# Altium PCB Urukul.PcbDoc (part 1 of 15)
Units mm, origin at the board's own origin, x right, y up, seen from the top; angles counter-clockwise.
Board outline 161.99 x 100 mm, 6 copper layers (L1, L2, L3, L4, P5, L6), stack 1.548 mm thick; 1078 components, 609 nets, 3798 pads, 2552 vias.
Unrouted connection lines stored in the file: 1.
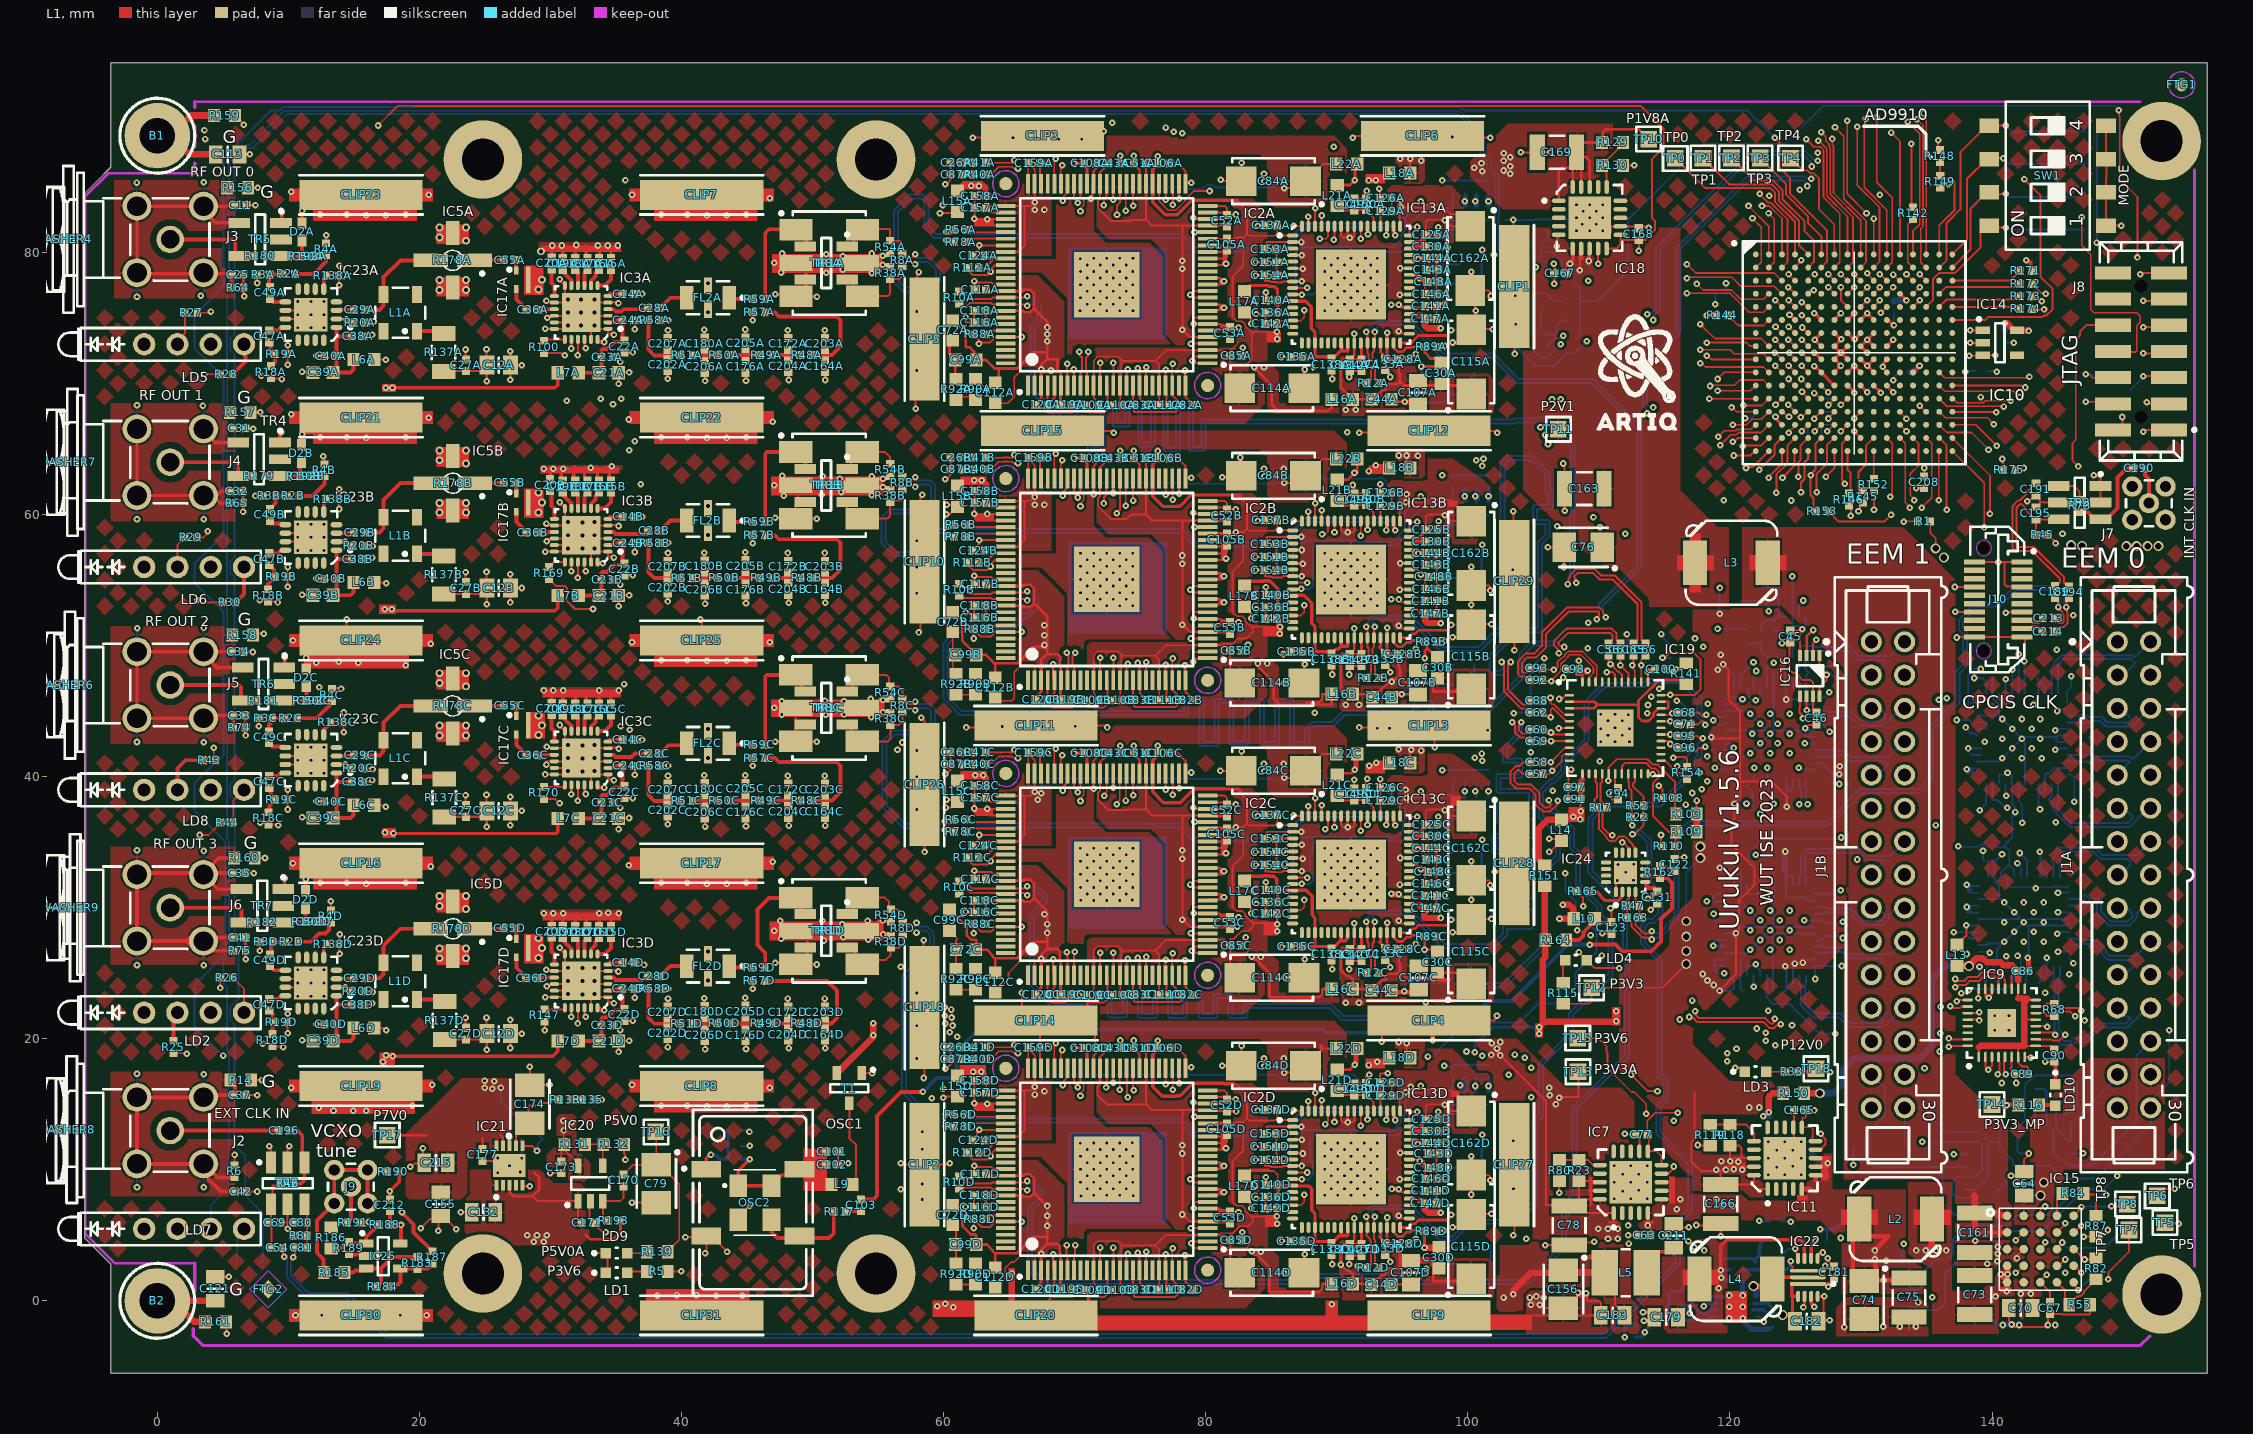
[diagram p0: L1 view]
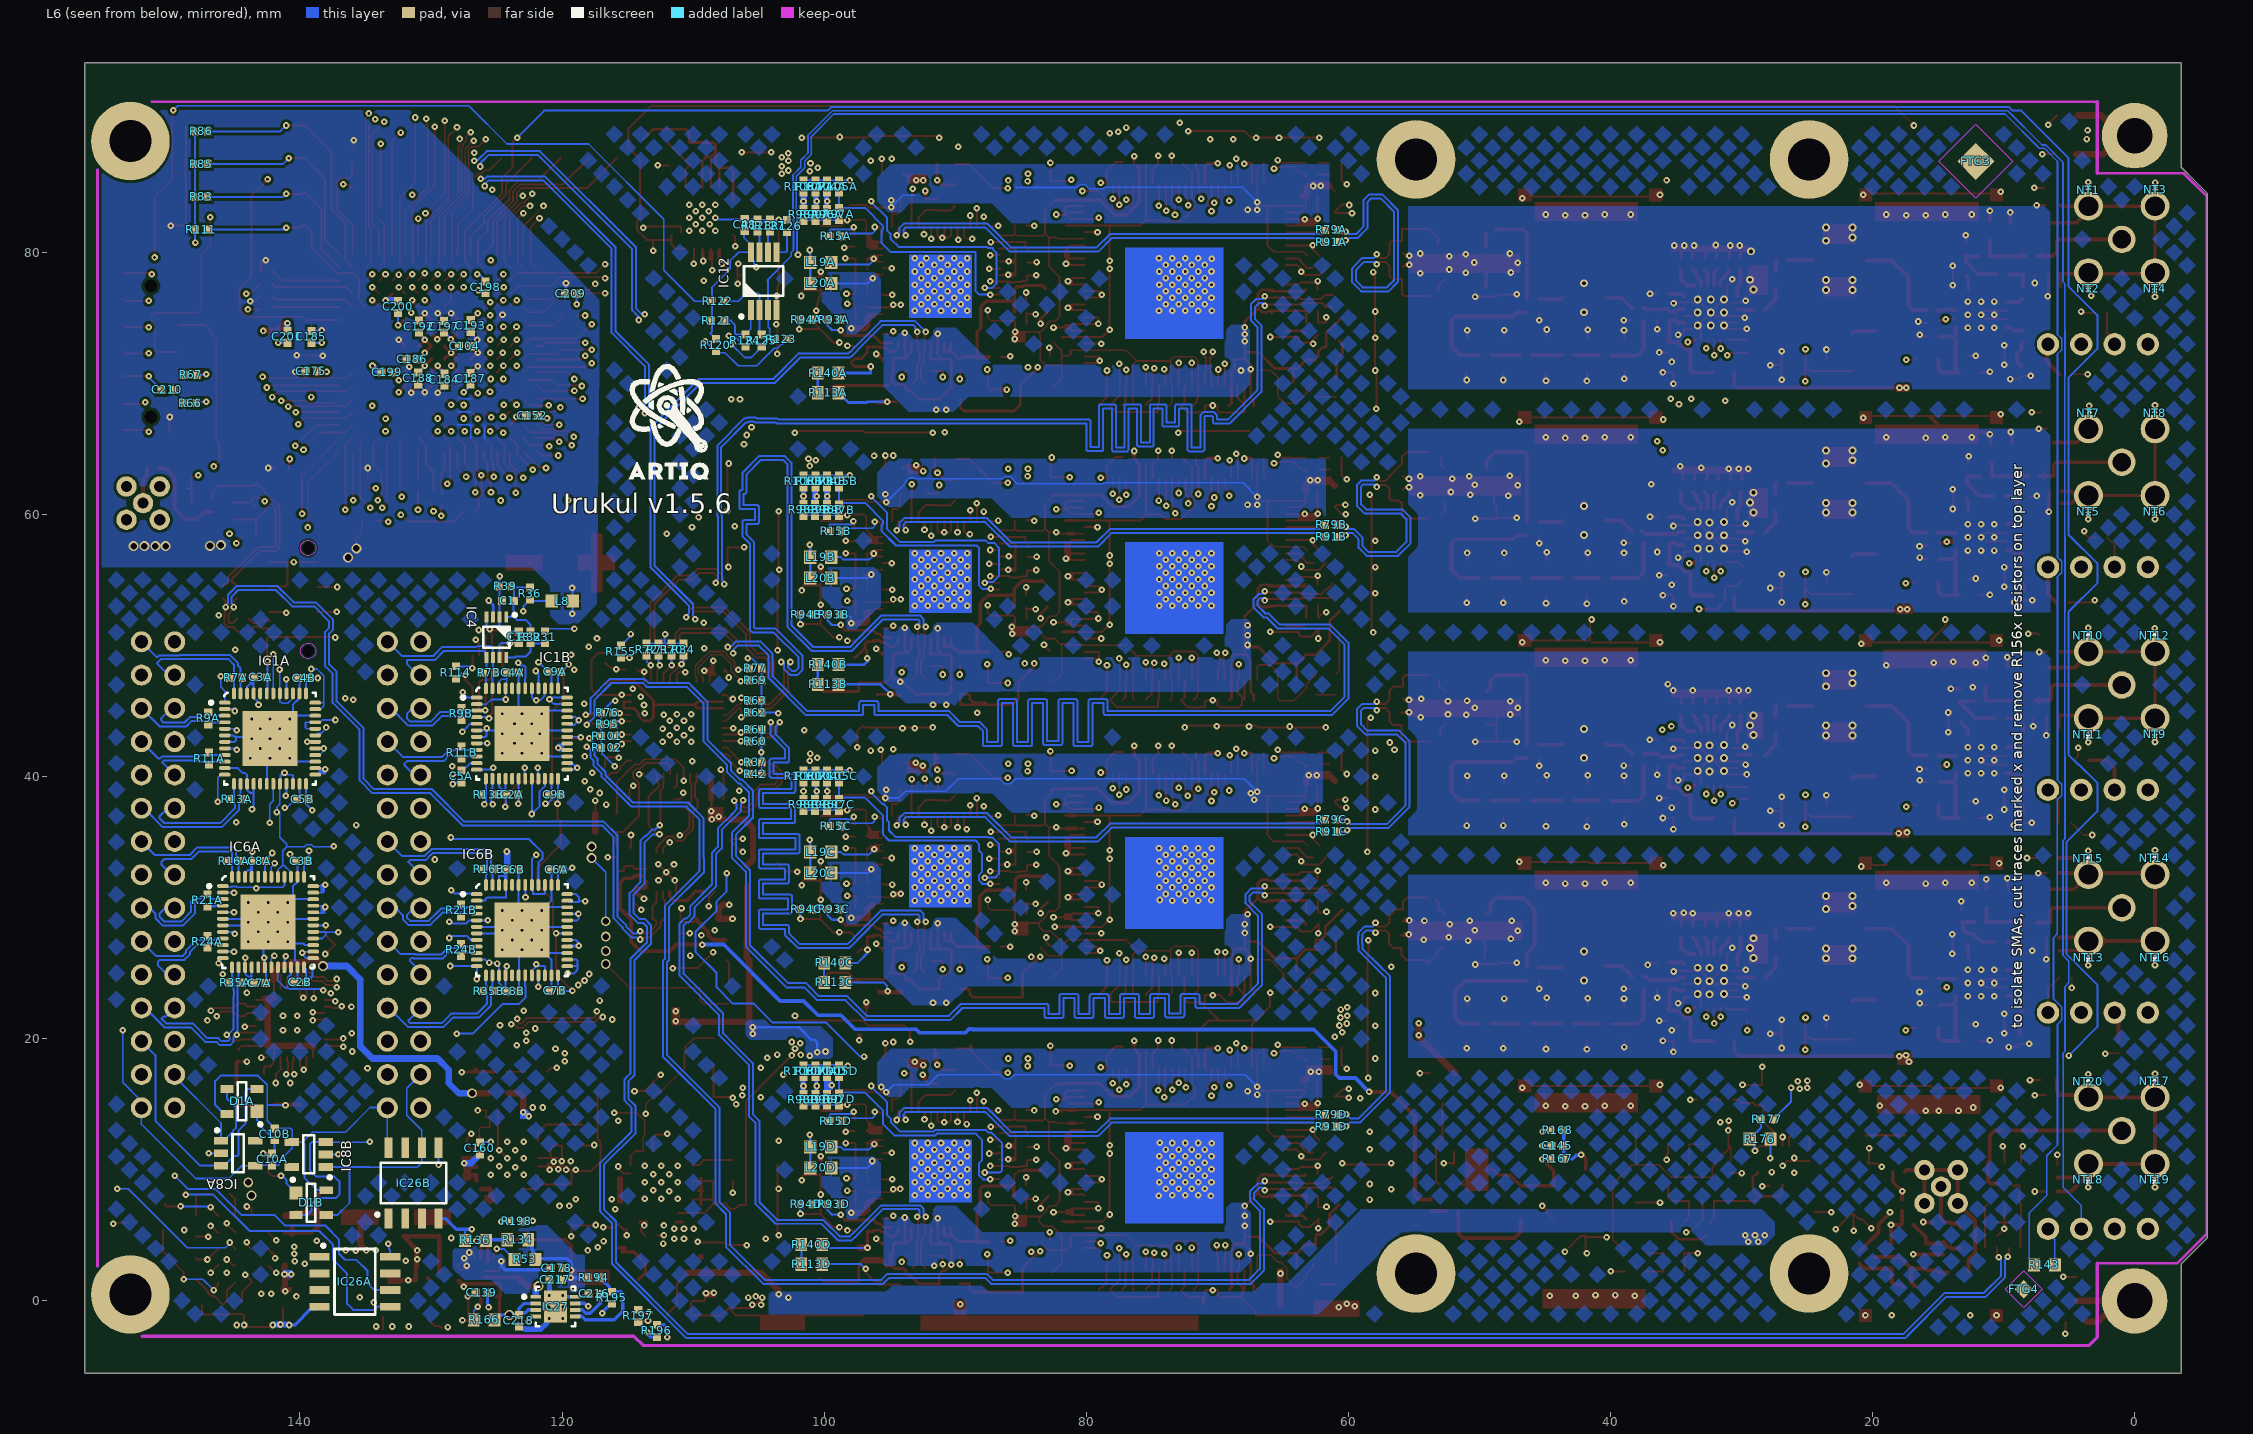
[diagram p1: L6 view, seen from below]
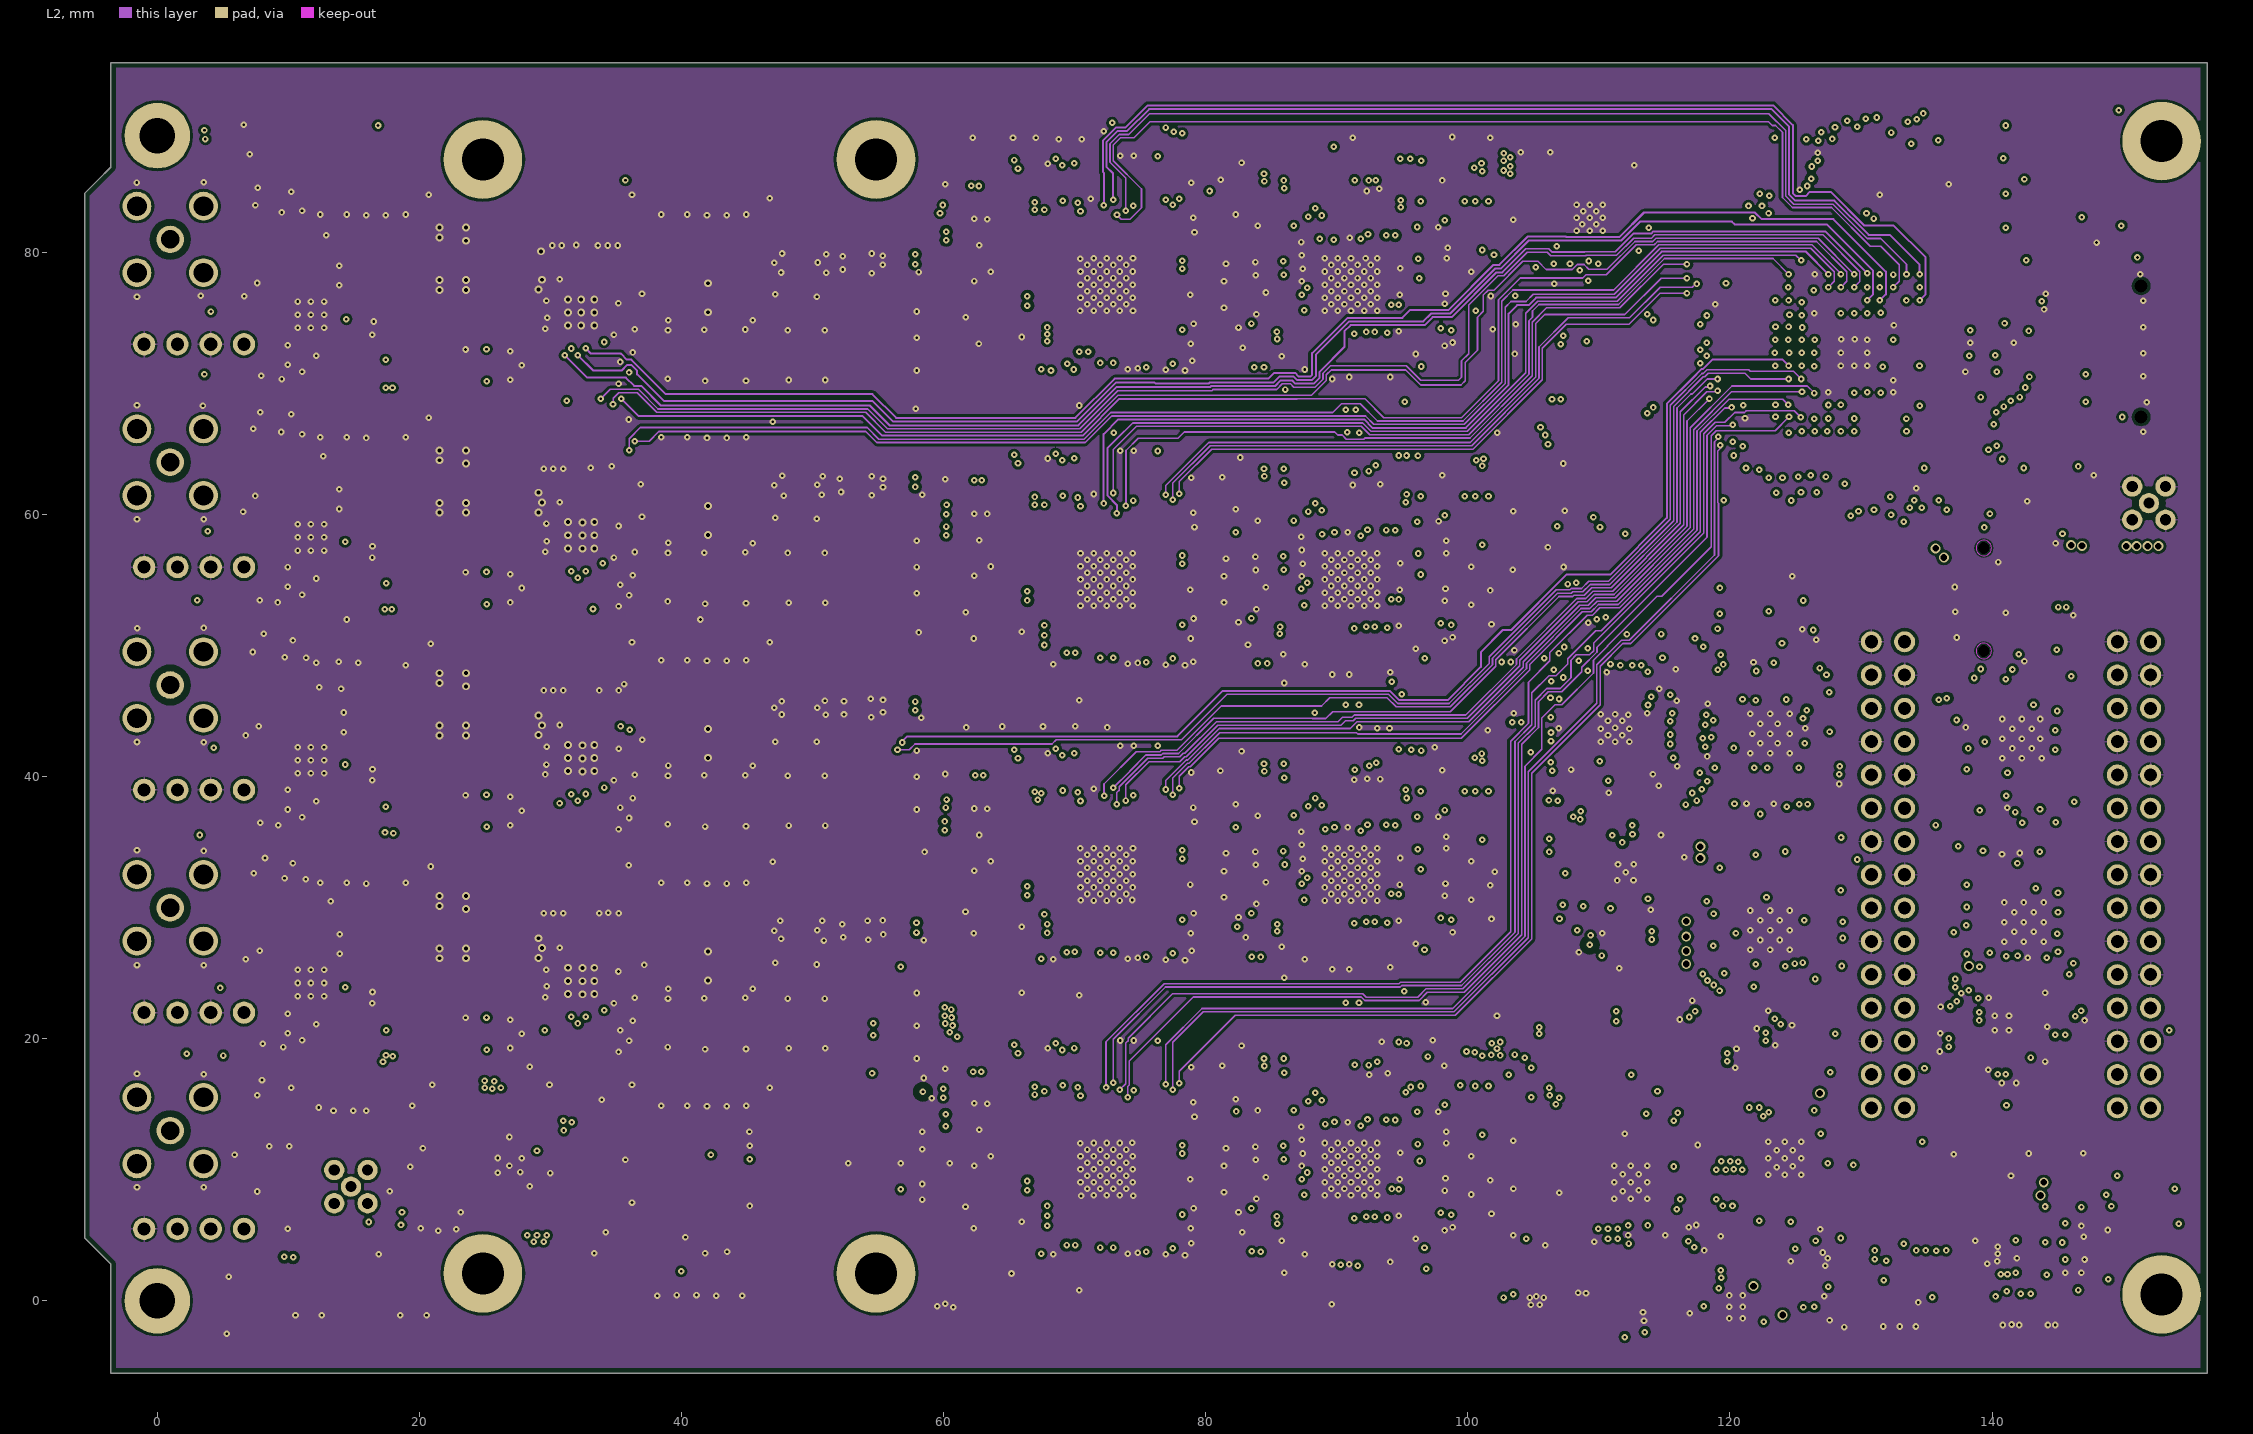
[diagram p2: L2]
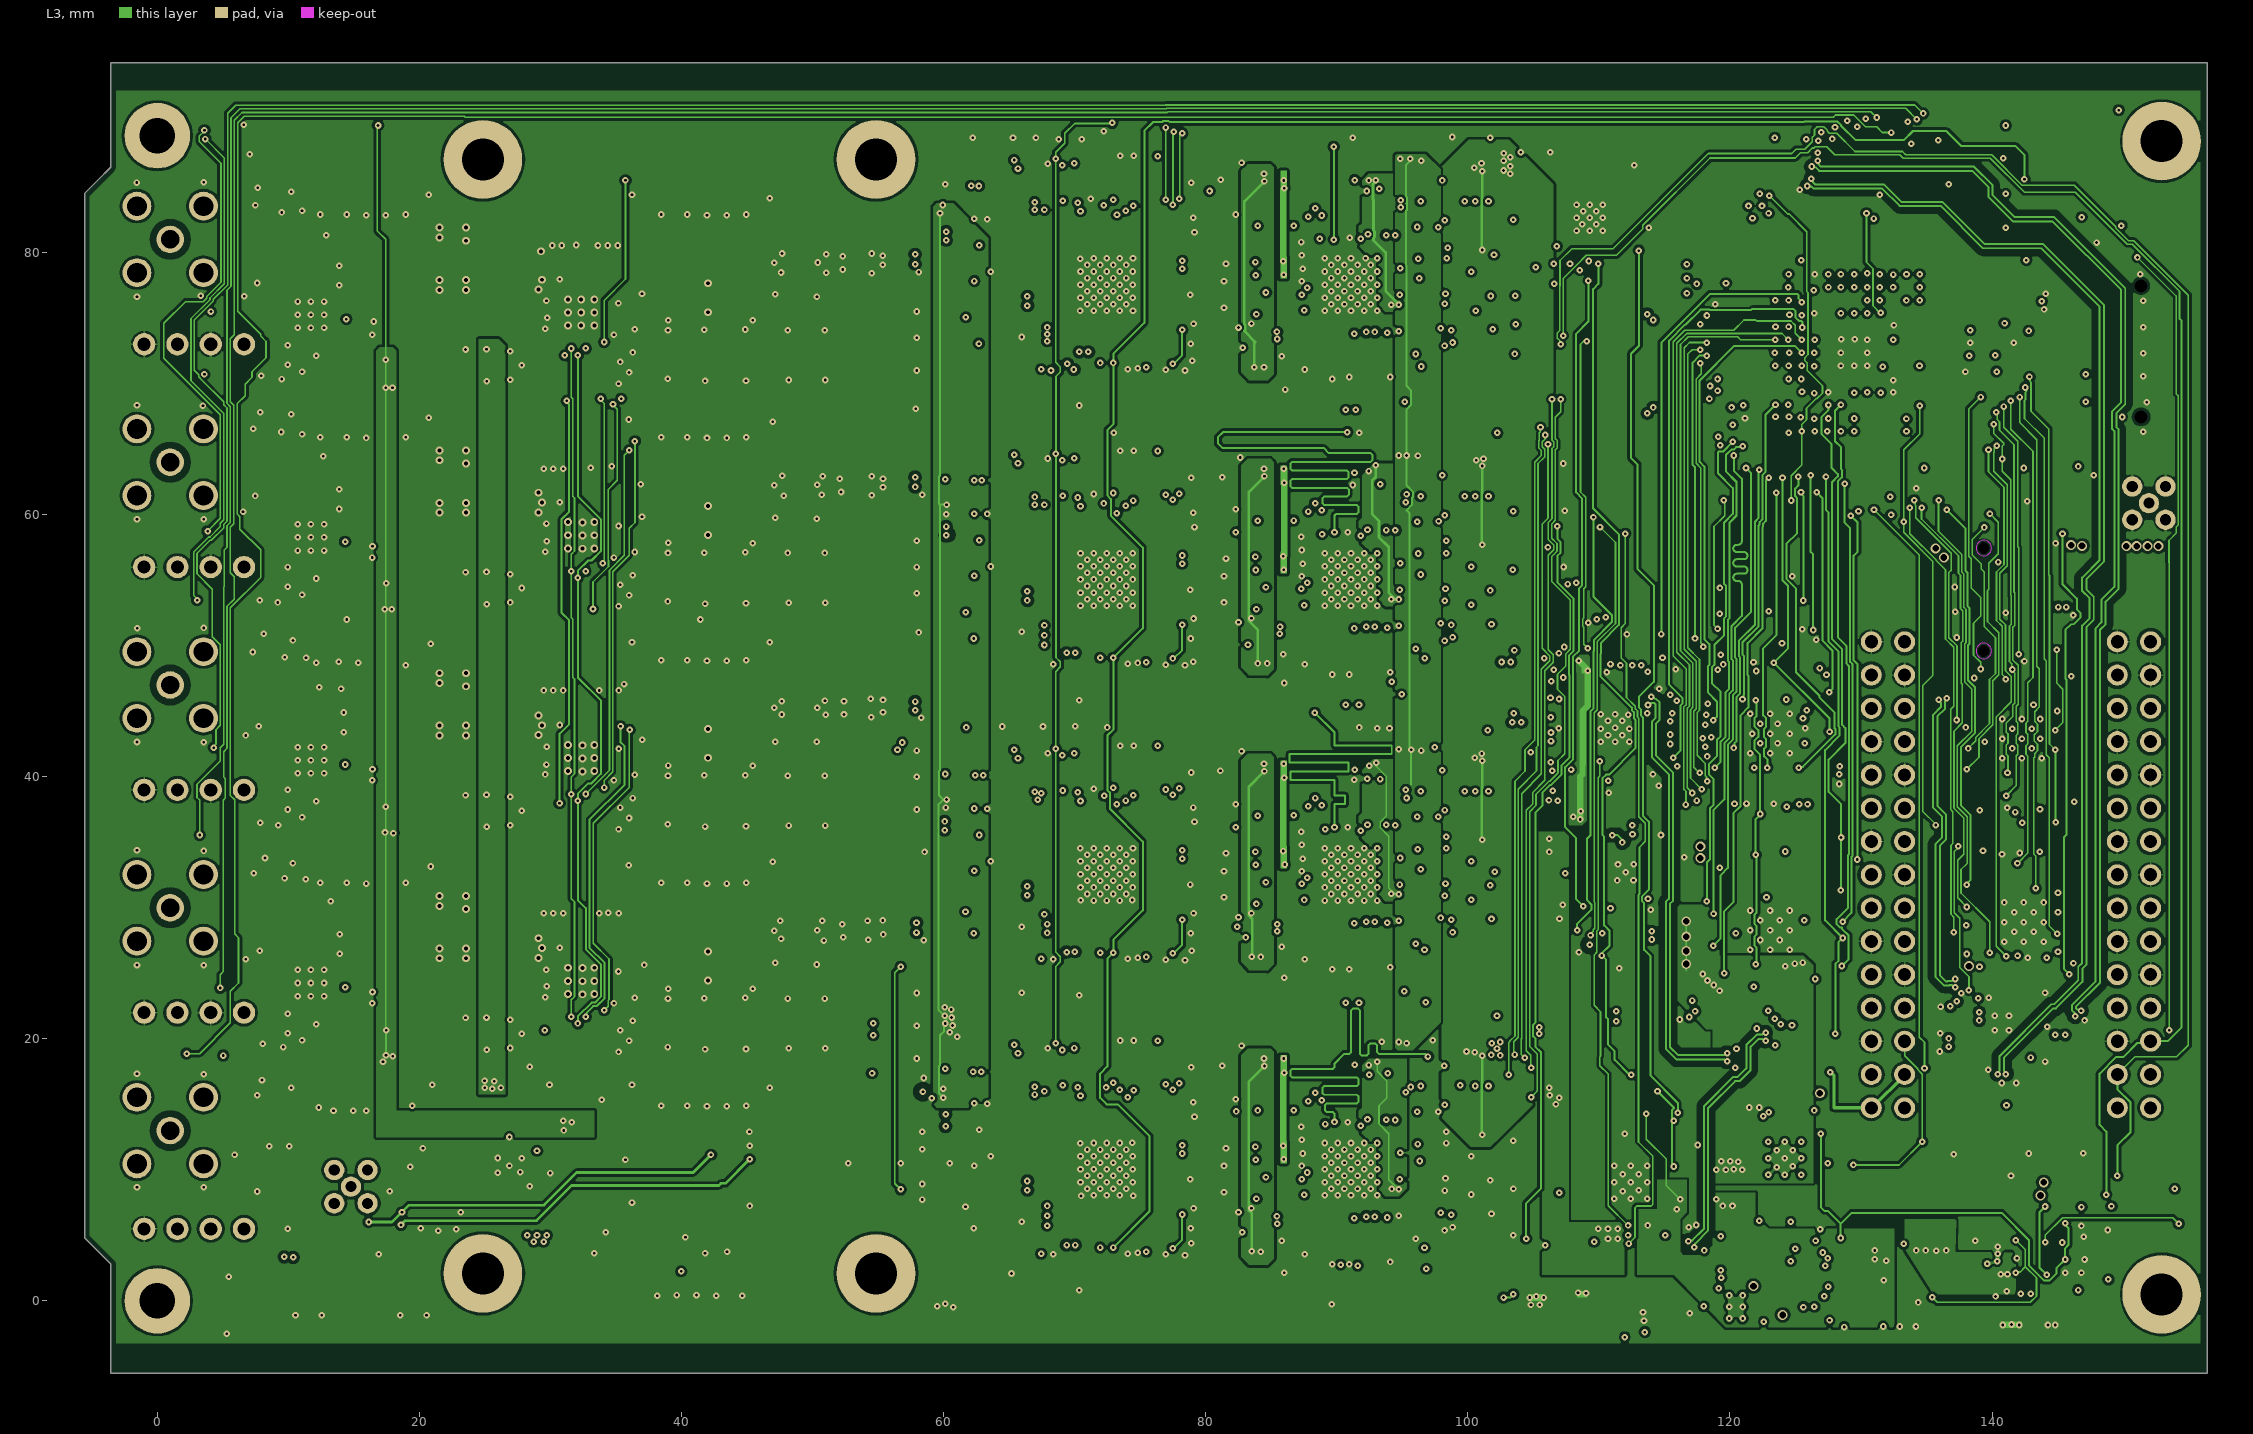
[diagram p3: L3]
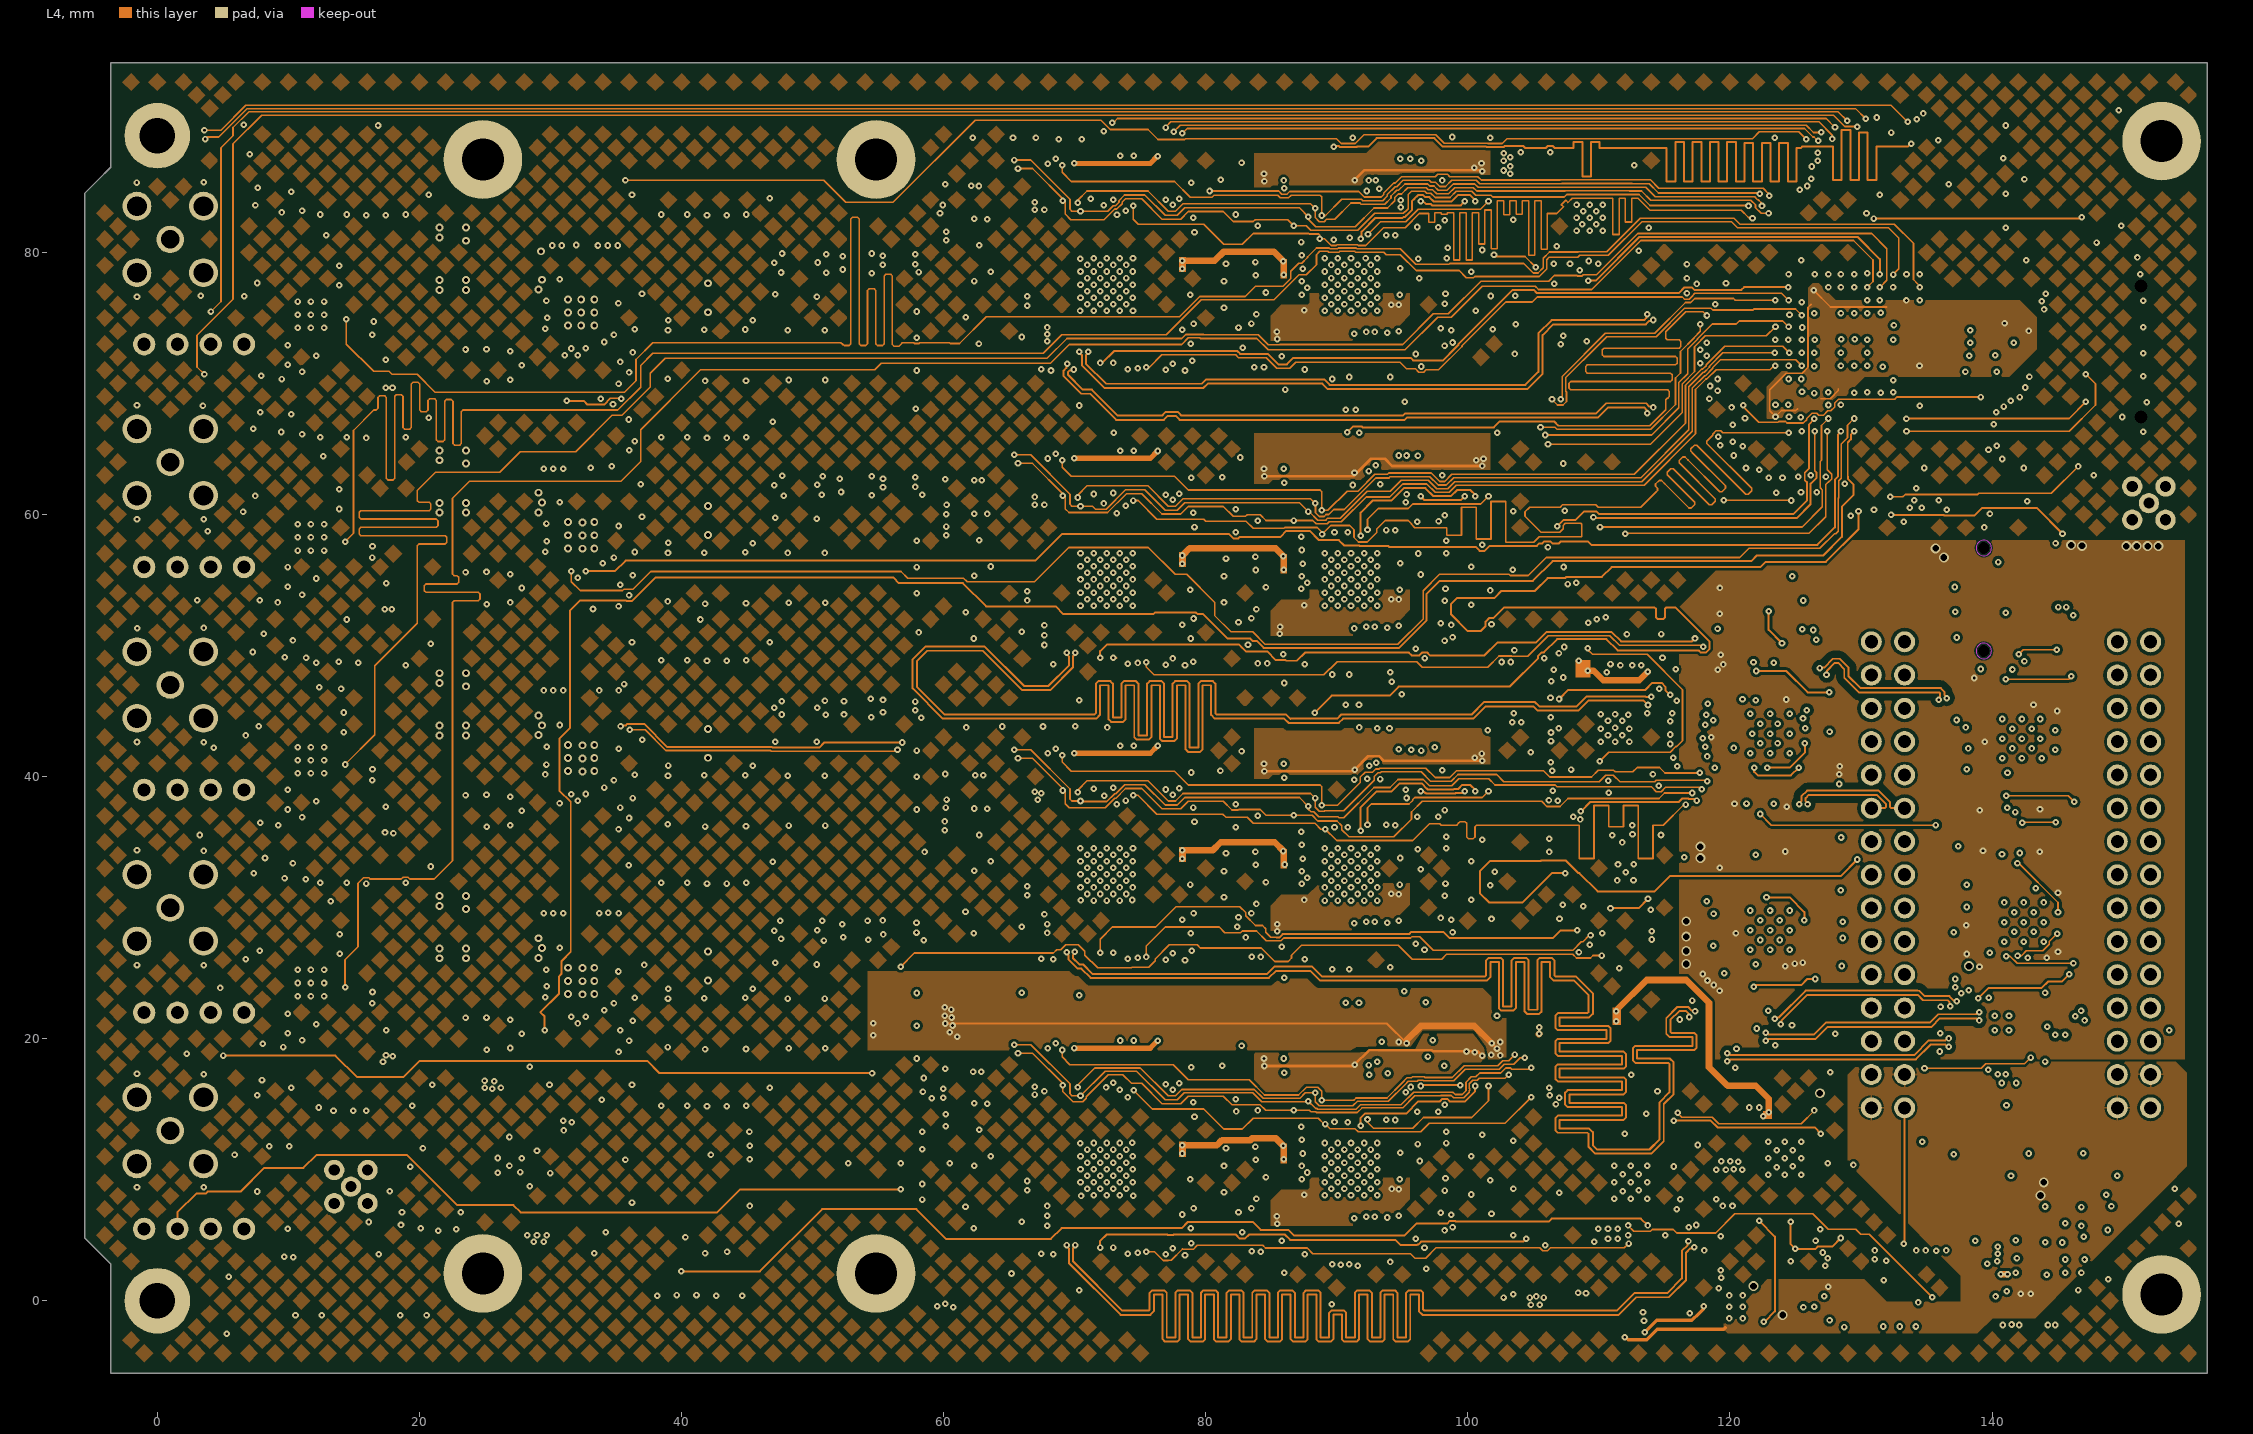
[diagram p4: L4]
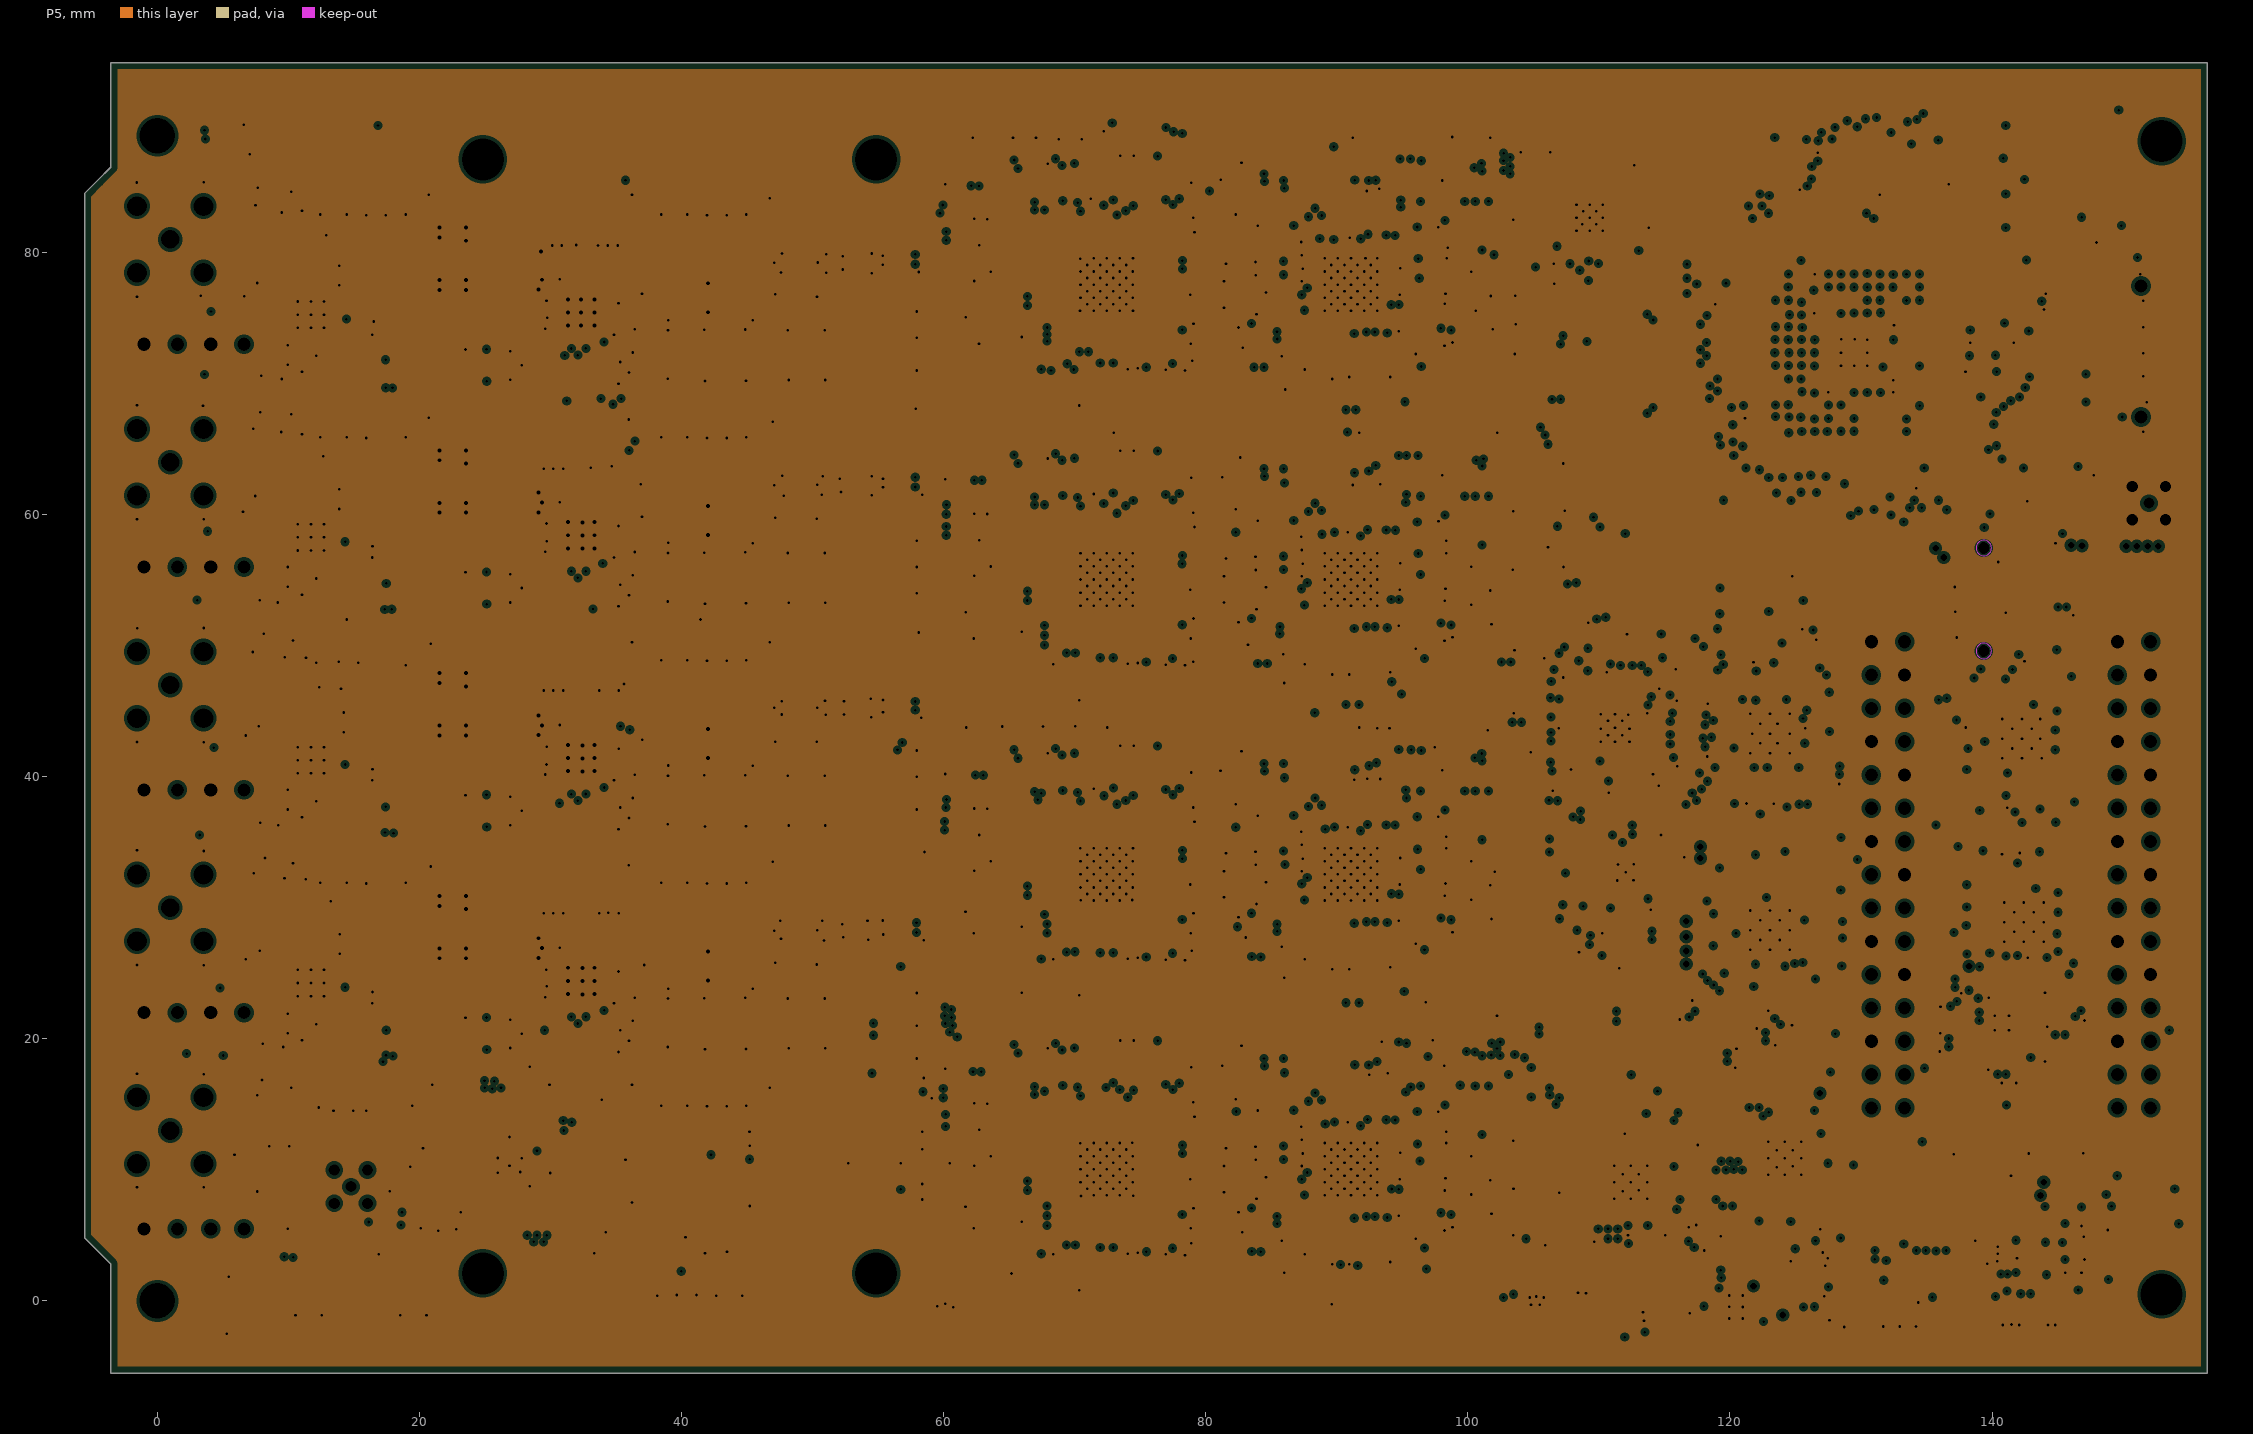
[diagram p5: P5, clearances drawn from the general rule]

## Layer stack, top to bottom
Top Solder: solder mask 0.034, Solder Resist, Dk 3.5
L1: signal copper 0.058
Dielectric1: core 0.18, FR4, Dk 4.2
L2: signal copper 0.018
Dielectric 9: prepreg 0.2, FR4, Dk 4.2
L3: signal copper 0.018
Dielectric 8: prepreg 0.6, Dk 4.2
L4: signal copper 0.018
Dielectric4: core 0.2, FR4, Dk 4.2
P5: plane copper 0.018, net GND
Dielectric3: core 0.18, FR4, Dk 4.2
L6: signal copper 0.058
Bottom Solder: solder mask 0.034, Solder Resist, Dk 3.5

## Board outline
-5.556,4.808 -5.556,77.513 -5.556,84.488 -4.556,85.488 -3.556,86.488 -3.556,94.488 156.439,94.488 156.439,-5.512 -3.556,-5.512 -3.556,2.808

## Design rules (kind name [scope] priority, off if disabled: settings)
AcuteAngle AcuteAngle_GND [InNet('GND')] p1: minimum=5.00000000000000E+0001 checktracksonly=FALSE
AcuteAngle [All] p2: minimum=5.00000000000000E+0001 checktracksonly=FALSE
BoardOutlineClearance BoardOutlineClearance_outer [OnBottomLayer OR OnTopLayer] p1: gap=0.25 ignorepadtopadclearanceinfootprint=FALSE
BoardOutlineClearance [OnCopper] p2: gap=0.4 ignorepadtopadclearanceinfootprint=FALSE
Clearance Clearance_1 [InPolygon vs (InDifferentialPairClass('All Differential Pairs'))] p1: gap=0.254 ignorepadtopadclearanceinfootprint=FALSE except(0: Arc-Hole Track-Hole SMDPad-Hole THPad-Hole Via-Hole Fill-Hole Poly-Hole Region-Hole Text-Hole; 0.508: Track-Poly)
Clearance Clearance_KeepOut [OnLayer('Keep-Out Layer') vs NOT (InComponent('J8') OR InComponent('J11'))] p2: gap=0.1 ignorepadtopadclearanceinfootprint=FALSE except(0: Arc-Hole Track-Hole SMDPad-Hole THPad-Hole Via-Hole Fill-Hole Poly-Hole Region-Hole Text-Hole)
Clearance Clearance_50_Ohms_GND_VIA [InNetClass('50_Ohms') vs (IsVia AND InNet('GND')) and not(IsPad)] p3: gap=0.2 ignorepadtopadclearanceinfootprint=FALSE except(0: Arc-Hole Track-Hole SMDPad-Hole THPad-Hole Via-Hole Fill-Hole Poly-Hole Region-Hole Text-Hole)
Clearance Clearance_50_Ohms_GND_Plane [InNetClass('50_Ohms') vs InPolygon] p4: gap=0.5 ignorepadtopadclearanceinfootprint=FALSE except(0: Arc-Hole Track-Hole SMDPad-Hole THPad-Hole Via-Hole Fill-Hole Poly-Hole Region-Hole Text-Hole)
Clearance Clearance_50_Ohms_GND_PADS [InNetClass('50_Ohms') vs InNet('GND')] p5: gap=0.2 ignorepadtopadclearanceinfootprint=FALSE except(0: Arc-Hole Track-Hole SMDPad-Hole THPad-Hole Via-Hole Fill-Hole Poly-Hole Region-Hole Text-Hole)
Clearance Clearance_50_Ohms [InNetClass('50_Ohms')] p6: gap=0.2 ignorepadtopadclearanceinfootprint=FALSE except(0: Arc-Hole Track-Hole SMDPad-Hole THPad-Hole Via-Hole Fill-Hole Poly-Hole Region-Hole Text-Hole)
Clearance Clearance_DiffPair_1 [(InDifferentialPairClass('All Differential Pairs')) vs (InDifferentialPairClass('All Differential Pairs'))] p7 off: gap=0.3 ignorepadtopadclearanceinfootprint=FALSE except(0: Arc-Hole Track-Hole SMDPad-Hole THPad-Hole Via-Hole Fill-Hole Poly-Hole Region-Hole Text-Hole)
Clearance [Not (OnLayer('Keep-Out Layer'))] p8: gap=0.127 ignorepadtopadclearanceinfootprint=FALSE except(0: Arc-Hole Track-Hole SMDPad-Hole THPad-Hole Via-Hole Fill-Hole Poly-Hole Region-Hole Text-Hole; 0.203: Arc-Poly Track-Poly SMDPad-Poly THPad-Poly Via-Poly Fill-Poly Poly-Poly)
Clearance Clearance_abs [All] p9: gap=0.1 ignorepadtopadclearanceinfootprint=FALSE except(0: Arc-Hole Track-Hole SMDPad-Hole THPad-Hole Via-Hole Fill-Hole Poly-Hole Region-Hole Text-Hole)
ComponentClearance [All] p1: gap=0 collisioncheckmode=3 verticalgap=0 showdistances=FALSE
DiffPairsRouting CLK_DiffPairsRouting [(InDifferentialPairClass('All Differential Pairs'))] p1: maxlimit=0.2 minlimit=0.15 mostfreqgap=0.17 toplayer_maxgap=0.16 toplayer_prefgap=0.16 toplayer_minwidth=0.14 toplayer_maxwidth=0.16 toplayer_prefwidth=0.152 midlayer2_mingap=0.16 midlayer2_maxgap=0.17 midlayer2_minwidth=0.14 midlayer2_maxwidth=0.16 midlayer2_prefwidth=0.15 midlayer3_mingap=0.16 midlayer3_maxgap=0.17 midlayer3_minwidth=0.14 midlayer3_maxwidth=0.16 midlayer3_prefwidth=0.15 bottomlayer_maxgap=0.16 bottomlayer_prefgap=0.16 bottomlayer_minwidth=0.14 bottomlayer_maxwidth=0.16 bottomlayer_prefwidth=0.152 impedanceprofiledriven=TRUE impedanceprofileid={BB04D2C2-95BE-479D-945A-180E0820E7BB} impedanceprofilevalue=100.000000 maxuncoupledlength=10
FabricationTestPointUsage TestPointUsage [All] p1: valid=0 allowmultiple=FALSE
FabricationTestpoint Testpoint [(IsPad And (OnTopLayer Or OnBottomLayer))] p1: side=3 testpointundercomponent=TRUE minsize=1.016 maxsize=2.54 preferedsize=1.524 minholesize=0 maxholesize=1.016 preferedholesize=0.813 testpointgrid=0.025 allowsidetop=TRUE allowsidebottom=TRUE usegrid=TRUE gridtolerance=0
Height BottomHeight [All] p1: minheight=0 maxheight=20 prefheight=10
Height TopHeight [OnLayer('Top Layer (LO)')] p2: minheight=0 maxheight=2.5 prefheight=1
HoleSize [All] p1: absolutevalues=TRUE maxlimit=5 minlimit=0.2 maxpercent=80.000 minpercent=20.000
HoleToHoleClearance [All] p1: gap=0.2 allowstackedmicrovias=TRUE
Length [All] p1 off: maxlimit=2540 minlimit=0
MatchedLengths "Diff pairs" [InDifferentialPairClass('All Differential Pairs')] p1: tolerance=2.54 checknetsindiffpair=TRUE checkdiffpairvsdiffpair=FALSE checkxsignals=FALSE checkothers=FALSE
MatchedLengths "Schematic Matched Net Lengths_1" [InNetClass('RFSW')] p2: tolerance=2.54 checknetsindiffpair=FALSE checkdiffpairvsdiffpair=TRUE checkxsignals=TRUE checkothers=TRUE
MatchedLengths "Schematic Matched Net Lengths" [InNetClass('RFSW_CPLD')] p3: tolerance=2.54 checknetsindiffpair=FALSE checkdiffpairvsdiffpair=TRUE checkxsignals=TRUE checkothers=TRUE
MatchedLengths DDS_UPDATE_AD9910 [InxSignalClass('DDS_UPDATE_AD9910')] p4: tolerance=2.54 checknetsindiffpair=FALSE checkdiffpairvsdiffpair=TRUE checkxsignals=TRUE checkothers=TRUE
MatchedLengths DDS_UPDATE_AD9912 [InxSignalClass('DDS_UPDATE_AD9912')] p5: tolerance=2.54 checknetsindiffpair=FALSE checkdiffpairvsdiffpair=TRUE checkxsignals=TRUE checkothers=TRUE
MatchedLengths "DDS SYNC" [InxSignalClass('DDSx_SYNC')] p6: tolerance=5 checknetsindiffpair=FALSE checkdiffpairvsdiffpair=TRUE checkxsignals=TRUE checkothers=TRUE
MatchedLengths "DDS RESET" [InxSignalClass('DDS_RESET')] p7: tolerance=2.54 checknetsindiffpair=FALSE checkdiffpairvsdiffpair=TRUE checkxsignals=TRUE checkothers=TRUE
MatchedLengths "CLK AD9912" [InxSignalClass('CLK AD9912')] p8: tolerance=5 checknetsindiffpair=FALSE checkdiffpairvsdiffpair=TRUE checkxsignals=TRUE checkothers=TRUE
MatchedLengths "CLK AD9910" [InxSignalClass('CLK AD9910')] p9: tolerance=5 checknetsindiffpair=FALSE checkdiffpairvsdiffpair=TRUE checkxsignals=TRUE checkothers=TRUE
MinimumAnnularRing MinimumAnnularRing_Blind [(InNetClass('50_Ohms') OR InDifferentialPairClass('All Differential Pairs'))] p1: minimumring=0.1
MinimumAnnularRing [All] p2: minimumring=0.1
MinimumSolderMaskSliver [All] p1: minsoldermaskwidth=0.05
PlaneClearance [All] p1: clearance=0.25
PlaneConnect PlaneConnect_pad [InPadClass('All Pads')] p1: planeconnectstyle=Relief reliefexpansion=0.508 reliefentries=4 reliefconductorwidth=0.254 reliefairgap=0.254
PlaneConnect [All] p2: planeconnectstyle=Direct reliefexpansion=0.508 reliefentries=4 reliefconductorwidth=0.254 reliefairgap=0.254
PolygonConnect PolygonConnect_pad [IsPad] p1: connectstyle=Relief reliefconductorwidth=0.15 reliefentries=4 polygonreliefangle="90 Angle" airgapwidth=0.152
PolygonConnect [All] p2: connectstyle=Direct reliefconductorwidth=0.254 reliefentries=4 polygonreliefangle="90 Angle" airgapwidth=0.254
RoomDefinition Urukul [InComponentClass('Urukul')] p1: confinementstyle=ConfineIn formatcopy=TRUE lockcomponents=FALSE outline -53.456,-101.612 -2.656,-101.612 -2.656,-76.212 -53.456,-76.212
RoomDefinition U_LVDS_IFCB [InComponentClass('U_LVDS_IFCB')] p2: confinementstyle=ConfineIn formatcopy=TRUE lockcomponents=FALSE outline -53.456,-101.612 -2.656,-101.612 -2.656,-76.212 -53.456,-76.212
RoomDefinition U_LVDS_IFCA [InComponentClass('U_LVDS_IFCA')] p3: confinementstyle=ConfineIn formatcopy=TRUE lockcomponents=FALSE outline -53.456,-101.612 -2.656,-101.612 -2.656,-76.212 -53.456,-76.212
RoomDefinition U_DDS_channel1 [InComponentClass('U_DDS_channel1')] p4: confinementstyle=ConfineIn formatcopy=TRUE lockcomponents=FALSE outline 59.794,45.138 102.394,45.138 102.394,65.138 59.794,65.138
RoomDefinition U_DDS_channel0 [InComponentClass('U_DDS_channel0')] p5: confinementstyle=ConfineIn formatcopy=TRUE lockcomponents=FALSE outline 59.794,67.638 102.394,67.638 102.394,87.638 59.794,87.638
RoomDefinition U_DDS_OUT_channel1 [InComponentClass('U_DDS_OUT_channel1')] p6: confinementstyle=ConfineIn formatcopy=TRUE lockcomponents=FALSE outline 1.544,66.388 58.544,66.388 58.544,52.388 1.544,52.388
RoomDefinition U_CTRL_LOGIC [InComponentClass('U_CTRL_LOGIC')] p7: confinementstyle=ConfineIn formatcopy=TRUE lockcomponents=FALSE outline 104.319,54.588 150.024,54.588 150.024,85.483 104.319,85.483
RoomDefinition U_DDS_OUT_channel0 [InComponentClass('U_DDS_OUT_channel0')] p8: confinementstyle=ConfineIn formatcopy=TRUE lockcomponents=FALSE outline 1.544,83.388 58.544,83.388 58.544,69.388 1.544,69.388
RoomDefinition U_DDS_OUT_channel3 [InComponentClass('U_DDS_OUT_channel3')] p9: confinementstyle=ConfineIn formatcopy=TRUE lockcomponents=FALSE outline 1.544,32.388 58.544,32.388 58.544,18.388 1.544,18.388
RoomDefinition U_DDS_OUT_channel2 [InComponentClass('U_DDS_OUT_channel2')] p10: confinementstyle=ConfineIn formatcopy=TRUE lockcomponents=FALSE outline 1.544,49.388 58.544,49.388 58.544,35.388 1.544,35.388
RoomDefinition U_CLK_INPUT [InComponentClass('U_CLK_INPUT')] p11: confinementstyle=ConfineIn formatcopy=TRUE lockcomponents=FALSE outline -5.456,-5.112 57.794,-5.112 57.794,17.138 -5.456,17.138
RoomDefinition U_Supply_DDS [InComponentClass('U_Supply_DDS')] p12: confinementstyle=ConfineIn formatcopy=TRUE lockcomponents=FALSE outline 128.544,-6.212 156.719,-6.212 156.719,56.788 128.544,56.788
RoomDefinition U_DDS_channel3 [InComponentClass('U_DDS_channel3')] p13: confinementstyle=ConfineIn formatcopy=TRUE lockcomponents=FALSE outline 59.794,0.138 102.394,0.138 102.394,20.138 59.794,20.138
RoomDefinition U_DDS_channel2 [InComponentClass('U_DDS_channel2')] p14: confinementstyle=ConfineIn formatcopy=TRUE lockcomponents=FALSE outline 59.794,22.638 102.394,22.638 102.394,42.638 59.794,42.638
RoutingVias [All] p1: holewidth=0.2 width=0.5 viastyle="Through Hole" minholewidth=0.2 minwidth=0.5 maxholewidth=0.6 maxwidth=1
SMDNeckDown [All] p1: percent=100.000
SMDToCorner [All] p1: distance=78740
SMDToPlane [All] p1: distance=0
SilkToSilkClearance [All] p1: silktosilkclearance=0
SilkToSolderMaskClearance SilkscreenOverComponentPads [IsPad] p1: minsilkscreentomaskgap=0 clearancetoexposedcopper=TRUE
SolderMaskExpansion SolderMaskExpansion_GND_VIA [IsVia AND InNet('GND')] p1: expansion=-0.1 istentingtop=FALSE
SolderMaskExpansion [All] p2: expansion=0.05 istentingtop=FALSE
Width Width-SE [InNetClass('50_Ohms')] p1: maxlimit=0.3 minlimit=0.159 preferedwidth=0.251 toplayer_minwidth=0.295 toplayer_prefwidth=0.298 bottomlayer_minwidth=0.295 bottomlayer_prefwidth=0.298 impedanceprofiledriven=TRUE impedanceprofileid={4DE8D0A8-98F2-4106-893B-CD1477E3F4D0} impedanceprofilevalue=50.000000 minimp=49.000000 maximp=51.000000 favimp=50.000000
Width [All] p2: maxlimit=3 minlimit=0.11 preferedwidth=0.254
18 further rules are at their usual default settings.

## Classes and differential pairs
net class RFSW: RFSW_CTRL0 RFSW_CTRL1 RFSW_CTRL2 RFSW_CTRL3
net class RFSW_CPLD: EEM1_4 EEM1_5 EEM1_6 EEM1_7
net class DDS_RESET[3..0]: DDS_RESET0 DDS_RESET1 DDS_RESET2 DDS_RESET3
net class OSK[3..0]: OSK0 OSK1 OSK2 OSK3
net class ATT_S_OUT[3..0]: ATT_S_OUT0 ATT_S_OUT1 ATT_S_OUT2 ATT_S_OUT3
net class ATT_S_IN[3..0]: ATT_S_IN0 ATT_S_IN1 ATT_S_IN2 ATT_S_IN3
net class ATT_LE[3..0]: ATT_LE0 ATT_LE1 ATT_LE2 ATT_LE3
net class 50_Ohms: CK_OSC CK_SMA_IN DAC_OUT_SEA DAC_OUT_SEB DAC_OUT_SEC DAC_OUT_SED INT_CLK_IN NetC28A_1 NetC28A_2 NetC28B_1 NetC28B_2 NetC28C_1 NetC28C_2 NetC28D_1 NetC28D_2 NetC29A_1 NetC29A_2 NetC29B_1 NetC29B_2 NetC29C_1 NetC29C_2 NetC29D_1 NetC29D_2 NetC36A_1 NetC36A_2 NetC36B_1 NetC36B_2 NetC36C_1 NetC36C_2 NetC36D_1 NetC36D_2 NetC47A_1 NetC47A_2 NetC47B_1 NetC47B_2 NetC47C_1 NetC47C_2 NetC47D_1 NetC47D_2 NetC49A_1 NetC49A_2 NetC49B_1 NetC49B_2 NetC49C_1 NetC49C_2 NetC49D_1 NetC49D_2 NetC50A_1 NetC50B_1 NetC50C_1 NetC50D_1 NetC55A_1 NetC55A_2 NetC55B_1 NetC55B_2 NetC55C_1 NetC55C_2 NetC55D_1 NetC55D_2 NetC103_2 NetC164A_1 NetC164B_1 NetC164C_1 NetC164D_1 NetC172A_1 NetC172B_1 NetC172C_1 NetC172D_1 NetC176A_1 NetC176B_1 NetC176C_1 NetC176D_1 NetC180A_1 NetC180B_1 NetC180C_1 NetC180D_1 NetC190_2 NetC196_2 NetC202A_1 NetC202B_1 NetC202C_1 NetC202D_1 NetFL2A_1 NetFL2B_1 NetFL2C_1 NetFL2D_1 NetJ3_1 NetJ4_1 NetJ5_1 NetJ6_1 NetOSC1_3 RF_OUT0 RF_OUT1 RF_OUT2 RF_OUT3
component class U_DDS_channel1: C26B C30B C43B C44B C51B C52B C53B C72B C82B C83B C84B C85B C87B C99B C105B C106B C107B C108B C109B C110B C111B C112B C114B C115B C116B C117B C118B C119B C120B C124B C125B C126B C127B C128B C129B C130B C133B C134B C135B C136B C137B C138B C140B C141B C142B C143B C144B C146B C147B C148B C149B C150B C151B C153B C154B C157B C158B C159B C162B IC2B IC13B L15B L16B L17B L18B L19B L20B L21B L22B R10B R12B R15B R40B R41B R56B R78B R79B R88B R89B R90B R91B R92B R93B R94B R96B R97B R98B R99B R104B R105B R106B R107B R112B R113B R140B
channel class LVDS_IFC_DDS: U_LVDS_IFC1 U_LVDS_IFCA U_LVDS_IFCB
component class U_CTRL_LOGIC: C104 C152 C175 C184 C185 C186 C187 C188 C192 C193 C197 C198 C199 C200 C201 C208 C209 C210 IC10 IC14 J8 R1 R66 R67 R83 R85 R86 R111 R142 R144 R145 R146 R148 R149 R171 R172 R173 R174 R175 SW1 TP0 TP1 TP2 TP3 TP4
component class U_CLK_INPUT: C54 C56 C57 C58 C59 C60 C61 C62 C65 C66 C68 C69 C71 C80 C81 C88 C91 C92 C93 C94 C95 C96 C97 C98 C100 C101 C102 C103 C122 C123 C131 C145 C189 C190 C191 C194 C195 C196 C212 C213 C214 IC19 IC24 IC25 J9 J10 L9 L10 L14 OSC1 OSC2 R17 R22 R34 R37 R42 R45 R46 R47 R52 R60 R61 R62 R63 R69 R70 R71 R72 R73 R76 R77 R81 R95 R101 R102 R103 R108 R109 R110 R117 R141 R151 R154 R155 R162 R163 R164 R165 R167 R168 R183 R184 R185 R186 R187 R188 R189 R190 R191 T1 TR2 TR3
component class Urukul: B1 B2 C1 C11 C13 C25 C31 C32 C33 C34 C35 C37 C41 C42 C45 C46 C86 C89 C90 C113 C121 CLIP1 CLIP2 CLIP3 CLIP4 CLIP5 CLIP6 CLIP7 CLIP8 CLIP9 CLIP10 CLIP11 CLIP12 CLIP13 CLIP14 CLIP15 CLIP16 CLIP17 CLIP18 CLIP19 CLIP20 CLIP21 CLIP22 CLIP23 CLIP24 CLIP25 CLIP26 CLIP27 CLIP28 CLIP29 CLIP30 CLIP31 FTG1 FTG2 FTG3 FTG4 IC4 IC9 IC16 J2 J3 J4 J5 J6 J7 L8 L13 LD2 LD5 LD6 LD8 NT1 NT2 NT3 NT4 NT5 NT6 NT7 NT8 NT9 NT10 NT11 NT12 NT13 NT14 NT15 NT16 NT17 NT18 NT19 NT20 R6 R14 R25 R26 R27 R28 R29 R30 R31 R32 R36 R39 R43 R44 R64 R65 R68 R74 R75 R100 R114 R147 R150 R152 R153 R156 R157 R158 R159 R160 R161 R169 R170 R179 R180 R181 R182 TR4 TR5 TR6 TR7 WASHER4 WASHER6 WASHER7 WASHER8 WASHER9
component class U_DDS_OUT_channel0: C12A C14A C15A C16A C17A C18A C19A C20A C21A C22A C23A C24A C27A C28A C29A C36A C38A C39A C40A C47A C49A C50A C55A C164A C172A C176A C180A C202A C203A C204A C205A C206A C207A D2A FL2A IC3A IC5A IC17A IC23A L1A L6A L7A R2A R3A R4A R8A R18A R19A R20A R38A R48A R49A R50A R51A R54A R57A R58A R59A R137A R138A R178A R192A TR1A TR8A
component class U_DDS_OUT_channel1: C12B C14B C15B C16B C17B C18B C19B C20B C21B C22B C23B C24B C27B C28B C29B C36B C38B C39B C40B C47B C49B C50B C55B C164B C172B C176B C180B C202B C203B C204B C205B C206B C207B D2B FL2B IC3B IC5B IC17B IC23B L1B L6B L7B R2B R3B R4B R8B R18B R19B R20B R38B R48B R49B R50B R51B R54B R57B R58B R59B R137B R138B R178B R192B TR1B TR8B
component class U_DDS_OUT_channel2: C12C C14C C15C C16C C17C C18C C19C C20C C21C C22C C23C C24C C27C C28C C29C C36C C38C C39C C40C C47C C49C C50C C55C C164C C172C C176C C180C C202C C203C C204C C205C C206C C207C D2C FL2C IC3C IC5C IC17C IC23C L1C L6C L7C R2C R3C R4C R8C R18C R19C R20C R38C R48C R49C R50C R51C R54C R57C R58C R59C R137C R138C R178C R192C TR1C TR8C
component class U_DDS_OUT_channel3: C12D C14D C15D C16D C17D C18D C19D C20D C21D C22D C23D C24D C27D C28D C29D C36D C38D C39D C40D C47D C49D C50D C55D C164D C172D C176D C180D C202D C203D C204D C205D C206D C207D D2D FL2D IC3D IC5D IC17D IC23D L1D L6D L7D R2D R3D R4D R8D R18D R19D R20D R38D R48D R49D R50D R51D R54D R57D R58D R59D R137D R138D R178D R192D TR1D TR8D
component class U_DDS_channel0: C26A C30A C43A C44A C51A C52A C53A C72A C82A C83A C84A C85A C87A C99A C105A C106A C107A C108A C109A C110A C111A C112A C114A C115A C116A C117A C118A C119A C120A C124A C125A C126A C127A C128A C129A C130A C133A C134A C135A C136A C137A C138A C140A C141A C142A C143A C144A C146A C147A C148A C149A C150A C151A C153A C154A C157A C158A C159A C162A IC2A IC13A L15A L16A L17A L18A L19A L20A L21A L22A R10A R12A R15A R40A R41A R56A R78A R79A R88A R89A R90A R91A R92A R93A R94A R96A R97A R98A R99A R104A R105A R106A R107A R112A R113A R140A
component class U_DDS_channel2: C26C C30C C43C C44C C51C C52C C53C C72C C82C C83C C84C C85C C87C C99C C105C C106C C107C C108C C109C C110C C111C C112C C114C C115C C116C C117C C118C C119C C120C C124C C125C C126C C127C C128C C129C C130C C133C C134C C135C C136C C137C C138C C140C C141C C142C C143C C144C C146C C147C C148C C149C C150C C151C C153C C154C C157C C158C C159C C162C IC2C IC13C L15C L16C L17C L18C L19C L20C L21C L22C R10C R12C R15C R40C R41C R56C R78C R79C R88C R89C R90C R91C R92C R93C R94C R96C R97C R98C R99C R104C R105C R106C R107C R112C R113C R140C
component class U_DDS_channel3: C26D C30D C43D C44D C51D C52D C53D C72D C82D C83D C84D C85D C87D C99D C105D C106D C107D C108D C109D C110D C111D C112D C114D C115D C116D C117D C118D C119D C120D C124D C125D C126D C127D C128D C129D C130D C133D C134D C135D C136D C137D C138D C140D C141D C142D C143D C144D C146D C147D C148D C149D C150D C151D C153D C154D C157D C158D C159D C162D IC2D IC13D L15D L16D L17D L18D L19D L20D L21D L22D R10D R12D R15D R40D R41D R56D R78D R79D R88D R89D R90D R91D R92D R93D R94D R96D R97D R98D R99D R104D R105D R106D R107D R112D R113D R140D
component class U_LVDS_IFCA: C2A C3A C4A C5A C6A C7A C8A C9A C10A D1A IC1A IC6A IC8A IC26A J1A R7A R9A R11A R13A R16A R21A R24A R35A
component class U_Supply_DDS: C48 C63 C64 C67 C70 C73 C74 C75 C76 C77 C78 C79 C132 C139 C155 C156 C160 C161 C163 C165 C166 C167 C168 C169 C170 C171 C173 C174 C177 C178 C179 C181 C182 C183 C211 C215 C216 C217 C218 IC7 IC11 IC12 IC15 IC18 IC20 IC21 IC22 IC27 L2 L3 L4 L5 LD1 LD3 LD4 LD7 LD9 LD10 R5 R23 R33 R53 R55 R80 R82 R84 R87 R115 R116 R118 R119 R120 R121 R122 R123 R124 R125 R126 R127 R128 R129 R130 R131 R132 R133 R134 R135 R136 R139 R143 R166 R176 R177 R193 R194 R195 R196 R197 R198 TP5 TP6 TP7 TP8 TP10 TP11 TP12 TP13 TP14 TP15 TP16 TP17 TP18
channel class DDS_channel: U_DDS_channel0 U_DDS_channel1 U_DDS_channel2 U_DDS_channel3
channel class DDS_OUT_channel: U_DDS_OUT_channel0 U_DDS_OUT_channel1 U_DDS_OUT_channel2 U_DDS_OUT_channel3
net class DDS_CSN[3..0]: DDS_CSN0 DDS_CSN1 DDS_CSN2 DDS_CSN3
net class DDS_SCKI[3..0]: DDS_SCKI0 DDS_SCKI1 DDS_SCKI2 DDS_SCKI3
net class DDS_SDI[3..0]: DDS_SDI0 DDS_SDI1 DDS_SDI2 DDS_SDI3
net class DDS_SDO[3..0]: DDS_SDO0 DDS_SDO1 DDS_SDO2 DDS_SDO3
net class DDS_UPDATE[3..0]: DDS_UPDATE0 DDS_UPDATE1 DDS_UPDATE2 DDS_UPDATE3
net class LED[7..0]: LED0 LED1 LED2 LED3 LED4 LED5 LED6 LED7
net class R\E\_DE[15..0]: R\E\_DE0 R\E\_DE1 R\E\_DE2 R\E\_DE3 R\E\_DE4 R\E\_DE5 R\E\_DE6 R\E\_DE7 R\E\_DE8 R\E\_DE9 R\E\_DE10 R\E\_DE11 R\E\_DE12 R\E\_DE13 R\E\_DE14 R\E\_DE15
net class DDS_PLL_LOCK[3..0]: DDS_PLL_LOCK0 DDS_PLL_LOCK1 DDS_PLL_LOCK2 DDS_PLL_LOCK3
net class SYNC_SMP_ERR[3..0]: SYNC_SMP_ERR0 SYNC_SMP_ERR1 SYNC_SMP_ERR2 SYNC_SMP_ERR3
net class DDS_CLK: DDS_CLKA_N DDS_CLKA_P DDS_CLKB0_N DDS_CLKB0_P DDS_CLKB1_N DDS_CLKB1_P DDS_CLKB2_N DDS_CLKB2_P DDS_CLKB3_N DDS_CLKB3_P DDS_CLKB_N DDS_CLKB_P DDS_CLKC_N DDS_CLKC_P DDS_CLKD_N DDS_CLKD_P
component class U_LVDS_IFCB: C2B C3B C4B C5B C6B C7B C8B C9B C10B D1B IC1B IC6B IC8B IC26B J1B R7B R9B R11B R13B R16B R21B R24B R35B
differential pair CPCIS_CLK: +CPCIS_CLK_P -CPCIS_CLK_N
differential pair DDS_CLKD: +DDS_CLKD_P -DDS_CLKD_N
differential pair DDS_CLKC: +DDS_CLKC_P -DDS_CLKC_N
differential pair DDS_CLKB: +DDS_CLKB_P -DDS_CLKB_N
differential pair DDS_CLKA: +DDS_CLKA_P -DDS_CLKA_N
differential pair CLKM: +CLKM_P -CLKM_N
differential pair CK_SMA: +CK_SMA_P -CK_SMA_N
differential pair CK_MMCX: +CK_MMCX_P -CK_MMCX_N
differential pair DAC_OUTD: +DAC_OUTD_P -DAC_OUTD_N
differential pair DAC_OUTC: +DAC_OUTC_P -DAC_OUTC_N
differential pair DAC_OUTB: +DAC_OUTB_P -DAC_OUTB_N
differential pair DAC_OUTA: +DAC_OUTA_P -DAC_OUTA_N
differential pair DAC_OUTRD: +DAC_OUTRD_P -DAC_OUTRD_N
differential pair DAC_OUTRC: +DAC_OUTRC_P -DAC_OUTRC_N
differential pair DAC_OUTRB: +DAC_OUTRB_P -DAC_OUTRB_N
differential pair DAC_OUTRA: +DAC_OUTRA_P -DAC_OUTRA_N
differential pair DDS_CLKB3: +DDS_CLKB3_P -DDS_CLKB3_N
differential pair DDS_CLKB2: +DDS_CLKB2_P -DDS_CLKB2_N
differential pair DDS_CLKB1: +DDS_CLKB1_P -DDS_CLKB1_N
differential pair DDS_CLKB0: +DDS_CLKB0_P -DDS_CLKB0_N
differential pair DDS3_SYNC_IN: +DDS3_SYNC_IN_P -DDS3_SYNC_IN_N
differential pair DDS2_SYNC_IN: +DDS2_SYNC_IN_P -DDS2_SYNC_IN_N
differential pair DDS1_SYNC_IN: +DDS1_SYNC_IN_P -DDS1_SYNC_IN_N
differential pair DDS0_SYNC_OUT: +DDS0_SYNC_OUT_P -DDS0_SYNC_OUT_N
differential pair DDS0_SYNC_IN: +DDS0_SYNC_IN_P -DDS0_SYNC_IN_N
differential pair LVDS7B: +LVDS7A_P -LVDS7A_N
differential pair LVDS7A: +LVDS7B_P -LVDS7B_N
differential pair CK_MMCX_IN: +CK_MMCX_IN_P -CK_MMCX_IN_N
differential pair LVDS7B: +LVDS6A_P -LVDS6A_N
differential pair LVDS7A: +LVDS6B_P -LVDS6B_N
differential pair LVDS6B: +LVDS5A_P -LVDS5A_N
differential pair LVDS6A: +LVDS5B_P -LVDS5B_N
differential pair LVDS5B: +LVDS4A_P -LVDS4A_N
differential pair LVDS5A: +LVDS4B_P -LVDS4B_N
differential pair LVDS4B: +LVDS3A_P -LVDS3A_N
differential pair LVDS4A: +LVDS3B_P -LVDS3B_N
differential pair LVDS3B: +LVDS2A_P -LVDS2A_N
differential pair LVDS3A: +LVDS2B_P -LVDS2B_N
differential pair LVDS2B: +LVDS1A_P -LVDS1A_N
differential pair LVDS2A: +LVDS1B_P -LVDS1B_N
differential pair CK_SMA_IN: +CK_SMA_IN_P -CK_SMA_IN_N
differential pair LVDS0A: +LVDS0B_P -LVDS0B_N
differential pair LVDS0B: +LVDS0A_P -LVDS0A_N
differential pair FB_SYNC: +FB_SYNC_P -FB_SYNC_N

## Components (designator, comment, footprint, x,y, rotation, side; value= is the part's Value field where it differs from the comment)
B1 "Plated Hole" MTG270_500 0,88.9 r90 top locked
B2 "Plated Hole" MTG270_500 0,0 r90 top locked
C1 "100nF" CAPC1005X55N 124.133,53.407 r180 bottom
C2A "100nF" CAPC1005X55N 123.808,38.632 r0 bottom (schematic designator C2)
C2B "100nF" CAPC1005X55N 139.981,24.296 r180 bottom (schematic designator C2)
C3A "100nF" CAPC1005X55N 143.006,47.571 r0 bottom (schematic designator C3)
C3B "100nF" CAPC1005X55N 139.856,33.546 r180 bottom (schematic designator C3)
C4A "100nF" CAPC1005X55N 123.758,47.932 r0 bottom (schematic designator C4)
C4B "100nF" CAPC1005X55N 139.681,47.521 r180 bottom (schematic designator C4)
C5A "100nF" CAPC1005X55N 127.683,40.007 r90 bottom (schematic designator C5)
C5B "100nF" CAPC1005X55N 139.781,38.271 r180 bottom (schematic designator C5)
C6A "100nF" CAPC1005X55N 120.408,32.907 r180 bottom (schematic designator C6)
C6B "100nF" CAPC1005X55N 123.733,32.907 r0 bottom (schematic designator C6)
C7A "100nF" CAPC1005X55N 143.056,24.246 r0 bottom (schematic designator C7)
C7B "100nF" CAPC1005X55N 120.508,23.657 r180 bottom (schematic designator C7)
C8A "100nF" CAPC1005X55N 143.081,33.546 r0 bottom (schematic designator C8)
C8B "100nF" CAPC1005X55N 123.733,23.607 r0 bottom (schematic designator C8)
C9A "100nF" CAPC1005X55N 120.533,47.982 r180 bottom (schematic designator C9)
C9B "100nF" CAPC1005X55N 120.558,38.632 r180 bottom (schematic designator C9)
C10A "100nF" CAPC1005X55N 142.123,10.783 r270 bottom (schematic designator C10)
C10B "100nF" CAPC1005X55N 141.923,12.708 r90 bottom (schematic designator C10)
C11 "10nF" CAPC1005X55N 6.346,83.596 r0 top
C12A "1uF" CAPC2012X140N 26.044,71.388 r180 top (schematic designator C12)
C12B "1uF" CAPC2012X140N 26.044,54.388 r180 top (schematic designator C12)
C12C "1uF" CAPC2012X140N 26.044,37.388 r180 top (schematic designator C12)
C12D "1uF" CAPC2012X140N 26.044,20.388 r180 top (schematic designator C12)
C13 "100nF" CAPC1005X55N 123.308,50.632 r270 bottom
C14A "10nF" CAPC1005X55N 35.944,76.813 r180 top (schematic designator C14)
C14B "10nF" CAPC1005X55N 35.944,59.813 r180 top (schematic designator C14)
C14C "10nF" CAPC1005X55N 35.944,42.813 r180 top (schematic designator C14)
C14D "10nF" CAPC1005X55N 35.944,25.813 r180 top (schematic designator C14)
C15A "10nF" CAPC1005X55N 34.615,79.128 r270 top (schematic designator C15)
C15B "10nF" CAPC1005X55N 34.615,62.128 r270 top (schematic designator C15)
C15C "10nF" CAPC1005X55N 34.615,45.128 r270 top (schematic designator C15)
C15D "10nF" CAPC1005X55N 34.615,28.128 r270 top (schematic designator C15)
C16A "10nF" CAPC1005X55N 33.715,79.128 r270 top (schematic designator C16)
C16B "10nF" CAPC1005X55N 33.715,62.128 r270 top (schematic designator C16)
C16C "10nF" CAPC1005X55N 33.715,45.128 r270 top (schematic designator C16)
C16D "10nF" CAPC1005X55N 33.715,28.128 r270 top (schematic designator C16)
C17A "10nF" CAPC1005X55N 32.815,79.128 r270 top (schematic designator C17)
C17B "10nF" CAPC1005X55N 32.815,62.128 r270 top (schematic designator C17)
C17C "10nF" CAPC1005X55N 32.815,45.128 r270 top (schematic designator C17)
C17D "10nF" CAPC1005X55N 32.815,28.128 r270 top (schematic designator C17)
C18A "10nF" CAPC1005X55N 31.89,79.128 r270 top (schematic designator C18)
C18B "10nF" CAPC1005X55N 31.89,62.128 r270 top (schematic designator C18)
C18C "10nF" CAPC1005X55N 31.89,45.128 r270 top (schematic designator C18)
C18D "10nF" CAPC1005X55N 31.89,28.128 r270 top (schematic designator C18)
C19A "10nF" CAPC1005X55N 30.94,79.128 r270 top (schematic designator C19)
C19B "10nF" CAPC1005X55N 30.94,62.128 r270 top (schematic designator C19)
C19C "10nF" CAPC1005X55N 30.94,45.128 r270 top (schematic designator C19)
C19D "10nF" CAPC1005X55N 30.94,28.128 r270 top (schematic designator C19)
C20A "10nF" CAPC1005X55N 30.094,79.163 r270 top (schematic designator C20)
C20B "10nF" CAPC1005X55N 29.973,62.249 r270 top (schematic designator C20)
C20C "10nF" CAPC1005X55N 30.094,45.163 r270 top (schematic designator C20)
C20D "10nF" CAPC1005X55N 30.094,28.163 r270 top (schematic designator C20)
C21A "10uF" CAPC1608X80N 34.444,70.813 r180 top (schematic designator C21)
C21B "10uF" CAPC1608X80N 34.444,53.813 r180 top (schematic designator C21)
C21C "10uF" CAPC1608X80N 34.444,36.813 r180 top (schematic designator C21)
C21D "10uF" CAPC1608X80N 34.444,19.813 r180 top (schematic designator C21)
C22A "100nF" CAPC1005X55N 35.644,72.813 r90 top (schematic designator C22)
C22B "100nF" CAPC1005X55N 35.644,55.813 r90 top (schematic designator C22)
C22C "100nF" CAPC1005X55N 35.644,38.813 r90 top (schematic designator C22)
C22D "100nF" CAPC1005X55N 35.644,21.813 r90 top (schematic designator C22)
C23A "1nF" CAPC1005X55N 34.344,72.013 r180 top (schematic designator C23)
C23B "1nF" CAPC1005X55N 34.344,55.013 r180 top (schematic designator C23)
C23C "1nF" CAPC1005X55N 34.344,38.013 r180 top (schematic designator C23)
C23D "1nF" CAPC1005X55N 34.344,21.013 r180 top (schematic designator C23)
C24A "100pF" CAPC1005X55N 35.944,74.813 r180 top (schematic designator C24)
C24B "100pF" CAPC1005X55N 35.944,57.813 r180 top (schematic designator C24)
C24C "100pF" CAPC1005X55N 35.944,40.813 r180 top (schematic designator C24)
C24D "100pF" CAPC1005X55N 35.944,23.813 r180 top (schematic designator C24)
C25 "10nF" CAPC1005X55N 6.131,78.308 r180 top
C26A "100pF" CAPC1005X55N 60.964,86.838 r0 top (schematic designator C26)
C26B "100pF" CAPC1005X55N 60.964,64.338 r0 top (schematic designator C26)
C26C "100pF" CAPC1005X55N 60.964,41.838 r0 top (schematic designator C26)
C26D "100pF" CAPC1005X55N 60.964,19.338 r0 top (schematic designator C26)
C27A "100nF" CAPC1005X55N 23.544,71.388 r270 top (schematic designator C27)
C27B "100nF" CAPC1005X55N 23.544,54.388 r270 top (schematic designator C27)
C27C "100nF" CAPC1005X55N 23.544,37.388 r270 top (schematic designator C27)
C27D "100nF" CAPC1005X55N 23.544,20.388 r270 top (schematic designator C27)
C28A "10nF" CAPC1005X55N 37.914,75.747 r180 top (schematic designator C28)
C28B "10nF" CAPC1005X55N 37.914,58.747 r180 top (schematic designator C28)
C28C "10nF" CAPC1005X55N 37.914,41.747 r180 top (schematic designator C28)
C28D "10nF" CAPC1005X55N 37.914,24.747 r180 top (schematic designator C28)
C29A "10nF" CAPC1005X55N 15.444,75.613 r180 top (schematic designator C29)
C29B "10nF" CAPC1005X55N 15.444,58.613 r180 top (schematic designator C29)
C29C "10nF" CAPC1005X55N 15.444,41.613 r180 top (schematic designator C29)
C29D "10nF" CAPC1005X55N 15.444,24.613 r180 top (schematic designator C29)
C30A "56pF" CAPC1608X87N 97.944,70.791 r90 top (schematic designator C30)
C30B "56pF" CAPC1608X87N 97.694,48.291 r90 top (schematic designator C30)
C30C "56pF" CAPC1608X87N 97.694,25.852 r90 top (schematic designator C30)
C30D "56pF" CAPC1608X87N 97.793,3.297 r90 top (schematic designator C30)
C31 "10nF" CAPC1005X55N 6.258,66.573 r0 top
C32 "10nF" CAPC1005X55N 6.072,61.766 r180 top
C33 "10nF" CAPC1005X55N 6.258,44.653 r0 top
C34 "10nF" CAPC1005X55N 6.158,49.53 r180 top
C35 "10nF" CAPC1005X55N 6.258,32.639 r0 top
C36A "10nF" CAPC1005X55N 28.644,75.613 r180 top (schematic designator C36)
C36B "10nF" CAPC1005X55N 28.644,58.613 r180 top (schematic designator C36)
C36C "10nF" CAPC1005X55N 28.644,41.613 r180 top (schematic designator C36)
C36D "10nF" CAPC1005X55N 28.6,24.613 r180 top (schematic designator C36)
C37 "10nF" CAPC1005X55N 6.309,15.697 r0 top
C38A "100pF" CAPC1005X55N 15.294,73.588 r0 top (schematic designator C38)
C38B "100pF" CAPC1005X55N 15.294,56.588 r0 top (schematic designator C38)
C38C "100pF" CAPC1005X55N 15.294,39.588 r0 top (schematic designator C38)
C38D "100pF" CAPC1005X55N 15.294,22.588 r0 top (schematic designator C38)
C39A "10uF" CAPC1608X80N 12.644,70.838 r0 top (schematic designator C39)
C39B "10uF" CAPC1608X80N 12.644,53.838 r0 top (schematic designator C39)
C39C "10uF" CAPC1608X80N 12.644,36.838 r0 top (schematic designator C39)
C39D "10uF" CAPC1608X80N 12.644,19.838 r0 top (schematic designator C39)
C40A "100nF" CAPC1005X55N 13.219,72.088 r0 top (schematic designator C40)
C40B "100nF" CAPC1005X55N 13.219,55.088 r0 top (schematic designator C40)
C40C "100nF" CAPC1005X55N 13.219,38.088 r0 top (schematic designator C40)
C40D "100nF" CAPC1005X55N 13.219,21.088 r0 top (schematic designator C40)
C41 "10nF" CAPC1005X55N 6.283,27.711 r180 top
C42 "10nF" CAPC1005X55N 6.364,8.338 r180 top
C43A "1uF" CAPC1005X55N 73.019,86.788 r180 top (schematic designator C43)
C43B "1uF" CAPC1005X55N 73.019,64.288 r180 top (schematic designator C43)
C43C "1uF" CAPC1005X55N 73.019,41.788 r180 top (schematic designator C43)
C43D "1uF" CAPC1005X55N 73.019,19.288 r180 top (schematic designator C43)
C44A "Undefined" CAPC1608X90N 93.424,68.778 r0 top (schematic designator C44)
C44B "Undefined" CAPC1608X90N 93.444,46.041 r0 top (schematic designator C44)
C44C "Undefined" CAPC1608X90N 93.394,23.713 r0 top (schematic designator C44)
C44D "Undefined" CAPC1608X90N 93.394,1.213 r0 top (schematic designator C44)
C45 "1uF" CAPC1005X55N 124.598,50.685 r270 top
C46 "100nF" CAPC1005X55N 126.598,44.435 r90 top
C47A "10nF" CAPC1005X55N 8.544,73.588 r270 top (schematic designator C47)
C47B "10nF" CAPC1005X55N 8.544,56.588 r270 top (schematic designator C47)
C47C "10nF" CAPC1005X55N 8.544,39.588 r270 top (schematic designator C47)
C47D "10nF" CAPC1005X55N 8.544,22.588 r270 top (schematic designator C47)
C48 "100nF" CAPC1005X55N 106.061,82.098 r270 bottom
C49A "10nF" CAPC1005X55N 8.585,76.911 r90 top (schematic designator C49)
C49B "10nF" CAPC1005X55N 8.585,59.969 r90 top (schematic designator C49)
C49C "10nF" CAPC1005X55N 8.534,43.002 r90 top (schematic designator C49)
C49D "10nF" CAPC1005X55N 8.585,25.984 r90 top (schematic designator C49)
C50A "10nF" CAPC1005X55N 11.469,79.68 r180 top (schematic designator C50)
C50B "10nF" CAPC1005X55N 11.344,62.913 r180 top (schematic designator C50)
C50C "10nF" CAPC1005X55N 11.819,45.788 r180 top (schematic designator C50)
C50D "10nF" CAPC1005X55N 11.794,28.913 r180 top (schematic designator C50)
C51A "100nF" CAPC1005X55N 74.969,86.788 r0 top (schematic designator C51)
C51B "100nF" CAPC1005X55N 74.969,64.288 r0 top (schematic designator C51)
C51C "100nF" CAPC1005X55N 74.969,41.788 r0 top (schematic designator C51)
C51D "100nF" CAPC1005X55N 74.969,19.288 r0 top (schematic designator C51)
C52A "100nF" CAPC1005X55N 81.619,82.416 r270 top (schematic designator C52)
C52B "100nF" CAPC1005X55N 81.619,59.916 r270 top (schematic designator C52)
C52C "100nF" CAPC1005X55N 81.619,37.416 r270 top (schematic designator C52)
C52D "100nF" CAPC1005X55N 81.619,14.916 r270 top (schematic designator C52)
C53A "100nF" CAPC1005X55N 81.844,73.841 r270 top (schematic designator C53)
C53B "100nF" CAPC1005X55N 81.844,51.341 r270 top (schematic designator C53)
C53C "100nF" CAPC1005X55N 81.844,28.841 r270 top (schematic designator C53)
C53D "100nF" CAPC1005X55N 81.844,6.341 r270 top (schematic designator C53)
C54 "100nF" CAPC1005X55N 9.144,4.038 r0 top
C55A "10nF" CAPC1005X55N 26.894,79.413 r180 top (schematic designator C55)
C55B "10nF" CAPC1005X55N 26.894,62.413 r180 top (schematic designator C55)
C55C "10nF" CAPC1005X55N 26.894,45.413 r180 top (schematic designator C55)
C55D "10nF" CAPC1005X55N 26.894,28.413 r180 top (schematic designator C55)
C56 "100nF" CAPC1005X55N 110.744,49.688 r270 top
C57 "100nF" CAPC1005X55N 105.244,40.188 r0 top
C58 "100nF" CAPC1005X55N 105.244,41.088 r0 top
C59 "100nF" CAPC1005X55N 105.244,42.688 r0 top
C60 "100nF" CAPC1005X55N 105.244,43.588 r0 top
C61 "100nF" CAPC1005X55N 111.644,49.688 r270 top
C62 "100nF" CAPC1005X55N 105.244,44.888 r0 top
C63 "1uF" CAPC1005X55N 113.473,4.999 r180 top
C64 "22uF" CAPC2012X135N 142.444,8.941 r270 top
C65 "100nF" CAPC1005X55N 112.644,49.688 r270 top
C66 "100nF" CAPC1005X55N 113.544,49.688 r270 top
C67 "100nF" CAPC1005X55N 144.432,-0.555 r90 top
C68 "100nF" CAPC1005X55N 116.544,44.888 r180 top
C69 "0.5pF" CAPC1005X50N 8.944,5.963 r180 top
C70 "22uF" CAPC2012X135N 142.182,-0.555 r0 top
C71 "100nF" CAPC1005X55N 116.544,43.988 r180 top
C72A "Undefined" CAPC1608X90N 60.694,74.041 r270 top (schematic designator C72)
C72B "Undefined" CAPC1608X90N 60.694,51.791 r270 top (schematic designator C72)
C72C "Undefined" CAPC1608X90N 61.694,26.791 r180 top (schematic designator C72)
C72D "Undefined" CAPC1608X90N 60.694,6.541 r270 top (schematic designator C72)
C73 "47uF" CAPC3225X270N 138.682,0.445 r270 top
C74 "22uF" CAPMP3528X210N 130.235,0.058 r270 top
C75 "47uF" CAPC3225X270N 133.661,0.254 r90 top
C76 "22uF" CAPMP3528X210N 108.817,57.493 r180 top
C77 "1uF" CAPC1005X55N 113.244,12.688 r0 top
C78 "47uF" CAPC3225X270N 107.723,5.749 r90 top
C79 "22uF" CAPMP3528X210N 38.074,8.938 r270 top
C80 "0.5pF" CAPC1005X50N 10.944,5.963 r180 top
C81 "100nF" CAPC1005X55N 10.969,4.063 r180 top
C82A "10nF" CAPC1005X55N 78.594,68.341 r180 top (schematic designator C82)
C82B "10nF" CAPC1005X55N 78.594,45.841 r180 top (schematic designator C82)
C82C "10nF" CAPC1005X55N 78.594,23.341 r180 top (schematic designator C82)
C82D "10nF" CAPC1005X55N 78.594,0.841 r180 top (schematic designator C82)
C83A "100nF" CAPC1005X55N 74.994,68.341 r180 top (schematic designator C83)
C83B "100nF" CAPC1005X55N 74.994,45.841 r180 top (schematic designator C83)
C83C "100nF" CAPC1005X55N 74.994,23.341 r180 top (schematic designator C83)
C83D "100nF" CAPC1005X55N 74.994,0.841 r180 top (schematic designator C83)
C84A "10uF" CAPMP6032X280N 85.164,85.438 r180 top (schematic designator C84)
C84B "10uF" CAPMP6032X280N 85.164,62.938 r180 top (schematic designator C84)
C84C "10uF" CAPMP6032X280N 85.164,40.438 r180 top (schematic designator C84)
C84D "10uF" CAPMP6032X280N 85.164,17.938 r180 top (schematic designator C84)
C85A "1uF" CAPC1005X55N 82.321,72.105 r180 top (schematic designator C85)
C85B "1uF" CAPC1005X55N 82.321,49.605 r180 top (schematic designator C85)
C85C "1uF" CAPC1005X55N 82.321,27.105 r180 top (schematic designator C85)
C85D "1uF" CAPC1005X55N 82.321,4.605 r180 top (schematic designator C85)
C86 "1uF" CAPC1005X55N 142.344,25.165 r180 top
C87A "100pF" CAPC1005X55N 60.964,85.938 r0 top (schematic designator C87)
C87B "100pF" CAPC1005X55N 60.964,63.438 r0 top (schematic designator C87)
C87C "100pF" CAPC1005X55N 60.964,40.938 r0 top (schematic designator C87)
C87D "100pF" CAPC1005X55N 60.964,18.438 r0 top (schematic designator C87)
C88 "100nF" CAPC1005X55N 105.244,45.788 r0 top
C89 "100nF" CAPC1005X55N 142.294,17.292 r0 top
C90 "100nF" CAPC1005X55N 144.741,18.705 r90 top
C91 "1uF" CAPC1005X55N 108.153,38.277 r0 top
C92 "100nF" CAPC1005X55N 105.244,47.348 r0 top
C93 "100nF" CAPC1005X55N 105.244,48.248 r0 top
C94 "100nF" CAPC1005X55N 111.444,38.688 r90 top
C95 "100nF" CAPC1005X55N 116.544,43.088 r180 top
C96 "100nF" CAPC1005X55N 116.544,42.188 r180 top
C97 "100pF" CAPC1005X55N 108.144,39.188 r0 top
C98 "100nF" CAPC1005X55N 108.044,48.188 r0 top
C99A "68pF" CAPC1608X87N 61.694,71.791 r180 top (schematic designator C99)
C99B "68pF" CAPC1608X87N 61.694,49.291 r180 top (schematic designator C99)
C99C "68pF" CAPC1608X87N 60.444,29.041 r270 top (schematic designator C99)
C99D "68pF" CAPC1608X87N 61.694,4.291 r180 top (schematic designator C99)
C100 "100nF" CAPC1005X55N 114.744,48.188 r180 top
C101 "1uF" CAPC1005X55N 51.494,11.388 r180 top
C102 "100nF" CAPC1005X55N 51.494,10.388 r180 top
C103 "100nF" CAPC1005X55N 53.699,7.291 r270 top
C104 "1uF" CAPC1005X55N 127.42,72.841 r180 bottom
C105A "100nF" CAPC1005X55N 81.619,80.591 r90 top (schematic designator C105)
C105B "100nF" CAPC1005X55N 81.619,58.091 r90 top (schematic designator C105)
C105C "100nF" CAPC1005X55N 81.619,35.591 r90 top (schematic designator C105)
C105D "100nF" CAPC1005X55N 81.619,13.091 r90 top (schematic designator C105)
C106A "100nF" CAPC1005X55N 76.794,86.788 r180 top (schematic designator C106)
C106B "100nF" CAPC1005X55N 76.794,64.288 r180 top (schematic designator C106)
C106C "100nF" CAPC1005X55N 76.794,41.788 r180 top (schematic designator C106)
C106D "100nF" CAPC1005X55N 76.794,19.288 r180 top (schematic designator C106)
C107A "820pF" CAPC2012X135N 96.194,69.291 r270 top (schematic designator C107)
C107B "820pF" CAPC2012X135N 96.194,47.168 r270 top (schematic designator C107)
C107C "820pF" CAPC2012X135N 96.244,24.633 r270 top (schematic designator C107)
C107D "820pF" CAPC2012X135N 95.66,2.154 r270 top (schematic designator C107)
C108A "100nF" CAPC1005X55N 71.169,86.788 r180 top (schematic designator C108)
C108B "100nF" CAPC1005X55N 71.169,64.288 r180 top (schematic designator C108)
C108C "100nF" CAPC1005X55N 71.169,41.788 r180 top (schematic designator C108)
C108D "100nF" CAPC1005X55N 71.169,19.288 r180 top (schematic designator C108)
C109A "100nF" CAPC1005X55N 71.394,68.316 r0 top (schematic designator C109)
C109B "100nF" CAPC1005X55N 71.394,45.816 r0 top (schematic designator C109)
C109C "100nF" CAPC1005X55N 71.394,23.316 r0 top (schematic designator C109)
C109D "100nF" CAPC1005X55N 71.394,0.816 r0 top (schematic designator C109)
C110A "100nF" CAPC1005X55N 73.194,68.316 r0 top (schematic designator C110)
C110B "100nF" CAPC1005X55N 73.194,45.816 r0 top (schematic designator C110)
C110C "100nF" CAPC1005X55N 73.194,23.316 r0 top (schematic designator C110)
C110D "100nF" CAPC1005X55N 73.194,0.816 r0 top (schematic designator C110)
C111A "10nF" CAPC1005X55N 76.794,68.341 r180 top (schematic designator C111)
C111B "10nF" CAPC1005X55N 76.794,45.841 r180 top (schematic designator C111)
C111C "10nF" CAPC1005X55N 76.794,23.341 r180 top (schematic designator C111)
C111D "10nF" CAPC1005X55N 76.794,0.841 r180 top (schematic designator C111)
C112A "Undefined" CAPC1608X90N 63.944,69.291 r270 top (schematic designator C112)
C112B "Undefined" CAPC1608X90N 63.944,46.791 r270 top (schematic designator C112)
C112C "Undefined" CAPC1608X90N 63.944,24.291 r270 top (schematic designator C112)
C112D "Undefined" CAPC1608X90N 63.944,1.791 r270 top (schematic designator C112)
C113 "Undefined" CAPC2012X135N 5.363,87.472 r0 top
C114A "10uF" CAPMP6032X280N 85.039,69.641 r0 top (schematic designator C114)
C114B "10uF" CAPMP6032X280N 85.039,47.141 r0 top (schematic designator C114)
C114C "10uF" CAPMP6032X280N 85.039,24.641 r0 top (schematic designator C114)
C114D "10uF" CAPMP6032X280N 85.039,2.141 r0 top (schematic designator C114)
C115A "10uF" CAPMP6032X280N 100.264,71.638 r90 top (schematic designator C115)
C115B "10uF" CAPMP6032X280N 100.264,49.138 r90 top (schematic designator C115)
C115C "10uF" CAPMP6032X280N 100.264,26.638 r90 top (schematic designator C115)
C115D "10uF" CAPMP6032X280N 100.264,4.138 r90 top (schematic designator C115)
C116A "1uF" CAPC1005X55N 62.764,74.638 r0 top (schematic designator C116)
C116B "1uF" CAPC1005X55N 62.764,52.138 r0 top (schematic designator C116)
C116C "1uF" CAPC1005X55N 62.764,29.638 r0 top (schematic designator C116)
C116D "1uF" CAPC1005X55N 62.764,7.138 r0 top (schematic designator C116)
C117A "100nF" CAPC1005X55N 62.794,77.163 r0 top (schematic designator C117)
C117B "100nF" CAPC1005X55N 62.794,54.663 r0 top (schematic designator C117)
C117C "100nF" CAPC1005X55N 62.794,32.163 r0 top (schematic designator C117)
C117D "100nF" CAPC1005X55N 62.794,9.663 r0 top (schematic designator C117)
C118A "100nF" CAPC1005X55N 62.764,75.538 r0 top (schematic designator C118)
C118B "100nF" CAPC1005X55N 62.764,53.038 r0 top (schematic designator C118)
C118C "100nF" CAPC1005X55N 62.764,30.538 r0 top (schematic designator C118)
C118D "100nF" CAPC1005X55N 62.764,8.038 r0 top (schematic designator C118)
C119A "100nF" CAPC1005X55N 69.319,68.363 r180 top (schematic designator C119)
C119B "100nF" CAPC1005X55N 69.319,45.863 r180 top (schematic designator C119)
C119C "100nF" CAPC1005X55N 69.319,23.363 r180 top (schematic designator C119)
C119D "100nF" CAPC1005X55N 69.319,0.863 r180 top (schematic designator C119)
C120A "10nF" CAPC1005X55N 67.469,68.363 r180 top (schematic designator C120)
C120B "10nF" CAPC1005X55N 67.469,45.863 r180 top (schematic designator C120)
C120C "10nF" CAPC1005X55N 67.469,23.363 r180 top (schematic designator C120)
C120D "10nF" CAPC1005X55N 67.469,0.863 r180 top (schematic designator C120)
C121 "Undefined" CAPC2012X135N 4.423,0.909 r90 top
C122 "100nF" CAPC1005X55N 115.776,33.263 r90 top
C123 "1uF" CAPC1005X55N 110.965,28.459 r90 top
C124A "1uF" CAPC1005X55N 62.664,79.738 r0 top (schematic designator C124)
C124B "1uF" CAPC1005X55N 62.664,57.238 r0 top (schematic designator C124)
C124C "1uF" CAPC1005X55N 62.664,34.738 r0 top (schematic designator C124)
C124D "1uF" CAPC1005X55N 62.664,12.238 r0 top (schematic designator C124)
C125A "1uF" CAPC1005X55N 97.234,81.338 r180 top (schematic designator C125)
C125B "1uF" CAPC1005X55N 97.234,58.838 r180 top (schematic designator C125)
C125C "1uF" CAPC1005X55N 97.234,36.338 r180 top (schematic designator C125)
C125D "1uF" CAPC1005X55N 97.234,13.838 r180 top (schematic designator C125)
C126A "10nF" CAPC1005X55N 93.734,84.141 r0 top (schematic designator C126)
C126B "10nF" CAPC1005X55N 93.734,61.641 r0 top (schematic designator C126)
C126C "10nF" CAPC1005X55N 93.734,39.141 r0 top (schematic designator C126)
C126D "10nF" CAPC1005X55N 93.734,16.641 r0 top (schematic designator C126)
C127A "1uF" CAPC1005X55N 91.884,71.388 r90 top (schematic designator C127)
C127B "1uF" CAPC1005X55N 91.884,48.888 r90 top (schematic designator C127)
C127C "1uF" CAPC1005X55N 91.884,26.388 r90 top (schematic designator C127)
C127D "1uF" CAPC1005X55N 91.884,3.888 r90 top (schematic designator C127)
C128A "10nF" CAPC1005X55N 95.069,71.838 r180 top (schematic designator C128)
C128B "10nF" CAPC1005X55N 95.069,49.338 r180 top (schematic designator C128)
C128C "10nF" CAPC1005X55N 95.069,26.838 r180 top (schematic designator C128)
C128D "10nF" CAPC1005X55N 95.069,4.338 r180 top (schematic designator C128)
C129A "100nF" CAPC1005X55N 93.734,83.138 r0 top (schematic designator C129)
C129B "100nF" CAPC1005X55N 93.734,60.638 r0 top (schematic designator C129)
C129C "100nF" CAPC1005X55N 93.734,38.138 r0 top (schematic designator C129)
C129D "100nF" CAPC1005X55N 93.734,15.638 r0 top (schematic designator C129)
C130A "100nF" CAPC1005X55N 97.234,80.438 r180 top (schematic designator C130)
C130B "100nF" CAPC1005X55N 97.234,57.938 r180 top (schematic designator C130)
C130C "100nF" CAPC1005X55N 97.234,35.438 r180 top (schematic designator C130)
C130D "100nF" CAPC1005X55N 97.234,12.938 r180 top (schematic designator C130)
C131 "100nF" CAPC1005X55N 114.456,30.777 r90 top
C132 "22uF" CAPC2012X135N 24.894,6.763 r0 top
C133A "100nF" CAPC1005X55N 93.694,71.463 r90 top (schematic designator C133)
C133B "100nF" CAPC1005X55N 93.694,48.963 r90 top (schematic designator C133)
C133C "100nF" CAPC1005X55N 93.694,26.463 r90 top (schematic designator C133)
C133D "100nF" CAPC1005X55N 93.694,3.963 r90 top (schematic designator C133)
C134A "100nF" CAPC1005X55N 90.984,71.388 r90 top (schematic designator C134)
C134B "100nF" CAPC1005X55N 90.984,48.888 r90 top (schematic designator C134)
C134C "100nF" CAPC1005X55N 90.984,26.388 r90 top (schematic designator C134)
C134D "100nF" CAPC1005X55N 90.984,3.888 r90 top (schematic designator C134)
C135A "1uF" CAPC1005X55N 86.944,72.029 r0 top (schematic designator C135)
C135B "1uF" CAPC1005X55N 86.944,49.529 r0 top (schematic designator C135)
C135C "1uF" CAPC1005X55N 86.944,27.029 r0 top (schematic designator C135)
C135D "1uF" CAPC1005X55N 86.944,4.529 r0 top (schematic designator C135)
C136A "10nF" CAPC1005X55N 85.013,75.407 r0 top (schematic designator C136)
C136B "10nF" CAPC1005X55N 85.013,52.907 r0 top (schematic designator C136)
C136C "10nF" CAPC1005X55N 85.013,30.407 r0 top (schematic designator C136)
C136D "10nF" CAPC1005X55N 85.013,7.907 r0 top (schematic designator C136)
C137A "1uF" CAPC1005X55N 84.994,82.063 r0 top (schematic designator C137)
C137B "1uF" CAPC1005X55N 84.994,59.563 r0 top (schematic designator C137)
C137C "1uF" CAPC1005X55N 84.994,37.063 r0 top (schematic designator C137)
C137D "1uF" CAPC1005X55N 84.994,14.563 r0 top (schematic designator C137)
C138A "100nF" CAPC1005X55N 89.594,71.438 r90 top (schematic designator C138)
C138B "100nF" CAPC1005X55N 89.594,48.938 r90 top (schematic designator C138)
C138C "100nF" CAPC1005X55N 89.594,26.438 r90 top (schematic designator C138)
C138D "100nF" CAPC1005X55N 89.594,3.938 r90 top (schematic designator C138)
C139 "100nF" CAPC1005X55N 126.141,0.61 r0 bottom
C140A "100nF" CAPC1005X55N 85.034,76.338 r0 top (schematic designator C140)
C140B "100nF" CAPC1005X55N 85.034,53.838 r0 top (schematic designator C140)
C140C "100nF" CAPC1005X55N 85.034,31.338 r0 top (schematic designator C140)
C140D "100nF" CAPC1005X55N 85.034,8.838 r0 top (schematic designator C140)
C141A "100nF" CAPC1005X55N 97.194,75.888 r180 top (schematic designator C141)
C141B "100nF" CAPC1005X55N 97.194,53.388 r180 top (schematic designator C141)
C141C "100nF" CAPC1005X55N 97.194,30.888 r180 top (schematic designator C141)
C141D "100nF" CAPC1005X55N 97.194,8.388 r180 top (schematic designator C141)
C142A "100nF" CAPC1005X55N 84.988,74.544 r0 top (schematic designator C142)
C142B "100nF" CAPC1005X55N 84.988,52.044 r0 top (schematic designator C142)
C142C "100nF" CAPC1005X55N 84.988,29.544 r0 top (schematic designator C142)
C142D "100nF" CAPC1005X55N 84.988,7.044 r0 top (schematic designator C142)
C143A "1uF" CAPC1005X55N 97.307,78.664 r180 top (schematic designator C143)
C143B "1uF" CAPC1005X55N 97.231,56.158 r180 top (schematic designator C143)
C143C "1uF" CAPC1005X55N 97.27,33.669 r180 top (schematic designator C143)
C143D "1uF" CAPC1005X55N 97.444,11.238 r180 top (schematic designator C143)
C144A "10nF" CAPC1005X55N 97.307,79.553 r180 top (schematic designator C144)
C144B "10nF" CAPC1005X55N 97.234,57.038 r180 top (schematic designator C144)
C144C "10nF" CAPC1005X55N 97.234,34.538 r180 top (schematic designator C144)
C144D "10nF" CAPC1005X55N 97.234,12.038 r180 top (schematic designator C144)
C145 "1uF" CAPC1005X55N 44.054,11.823 r180 bottom
C146A "1uF" CAPC1005X55N 97.231,76.804 r180 top (schematic designator C146)
C146B "1uF" CAPC1005X55N 97.231,54.304 r180 top (schematic designator C146)
C146C "1uF" CAPC1005X55N 97.231,31.804 r180 top (schematic designator C146)
C146D "1uF" CAPC1005X55N 97.231,9.304 r180 top (schematic designator C146)
C147A "10nF" CAPC1005X55N 97.169,74.938 r180 top (schematic designator C147)
C147B "10nF" CAPC1005X55N 97.169,52.438 r180 top (schematic designator C147)
C147C "10nF" CAPC1005X55N 97.169,29.938 r180 top (schematic designator C147)
C147D "10nF" CAPC1005X55N 97.169,7.438 r180 top (schematic designator C147)
C148A "100nF" CAPC1005X55N 97.384,77.749 r180 top (schematic designator C148)
C148B "100nF" CAPC1005X55N 97.444,55.238 r180 top (schematic designator C148)
C148C "100nF" CAPC1005X55N 97.397,32.729 r180 top (schematic designator C148)